# Altium PCB PCB.PcbDoc (part 1 of 2)
Units mm, origin at the board's own origin, x right, y up, seen from the top; angles counter-clockwise.
Board outline 80 x 80 mm, 4 copper layers (Top Layer, GND, PWR, Bottom Layer), stack 0.603 mm thick; 78 components, 41 nets, 213 pads, 529 vias.
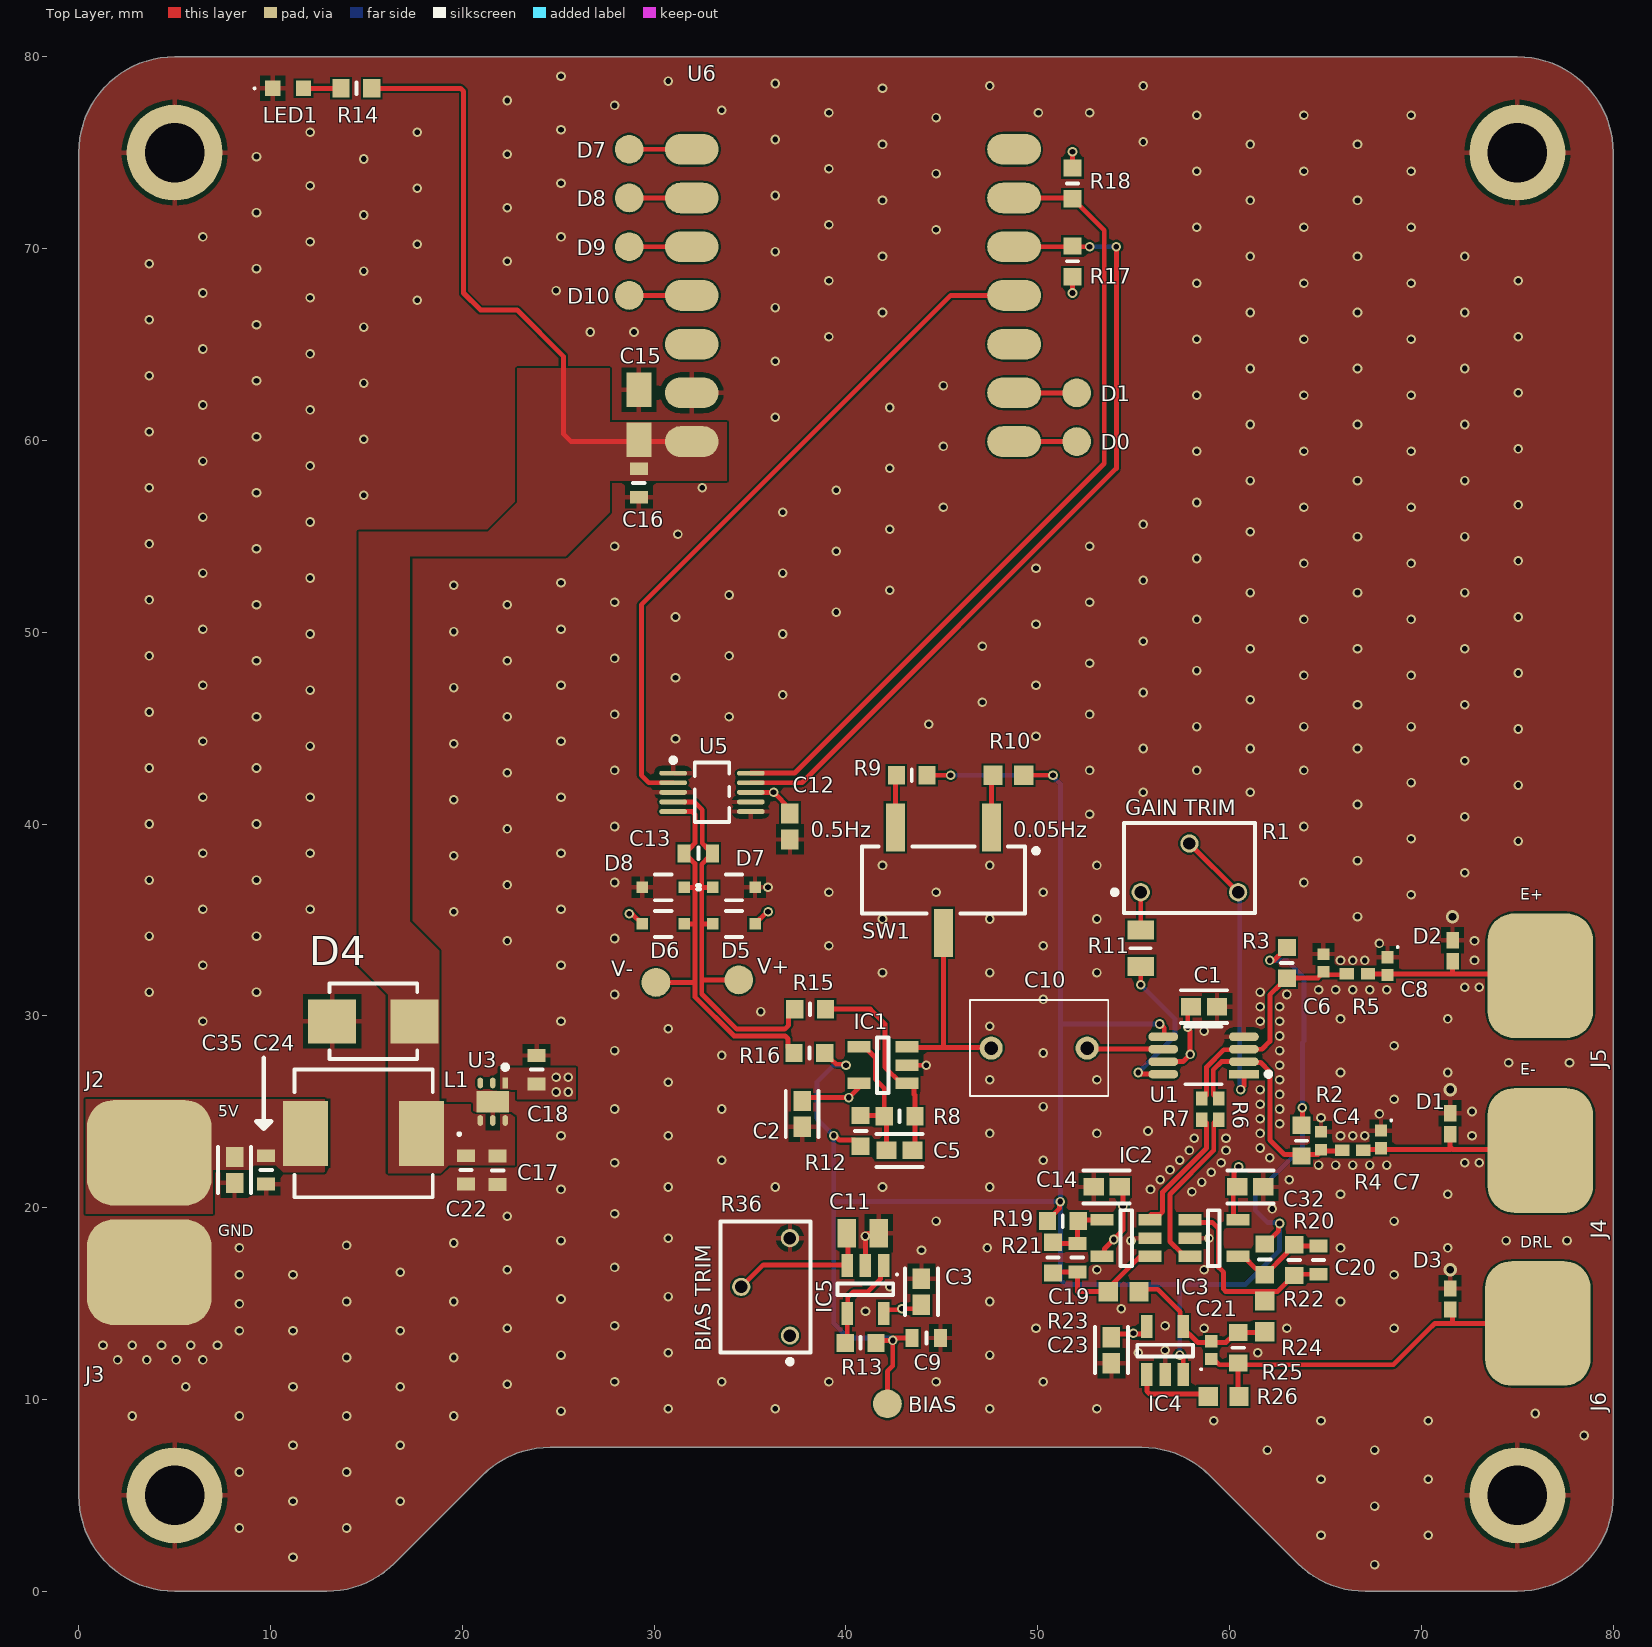
[diagram p0: Top Layer view]
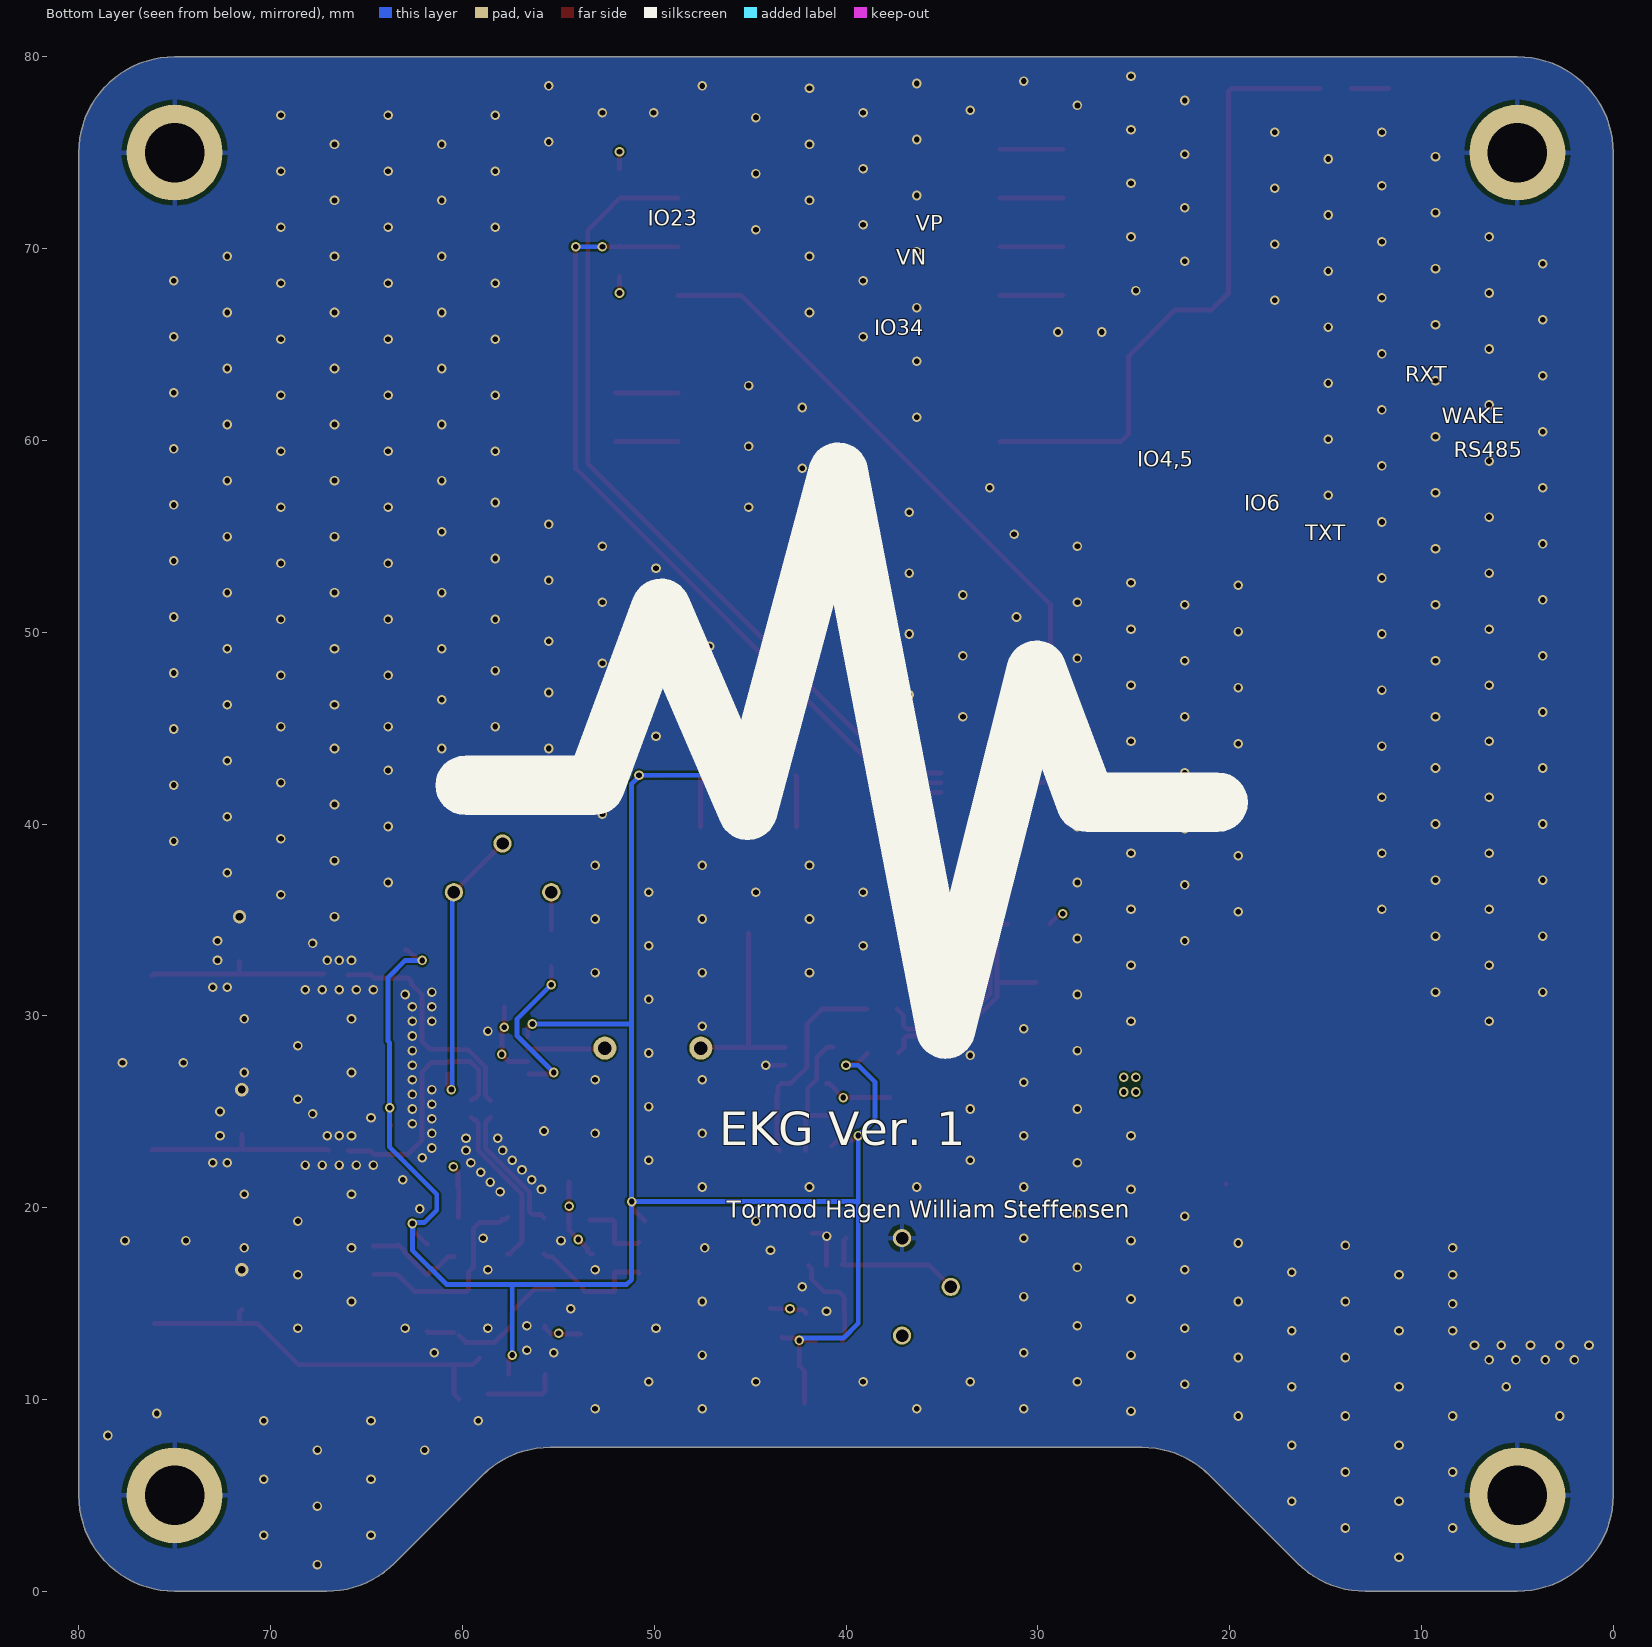
[diagram p1: Bottom Layer view, seen from below]
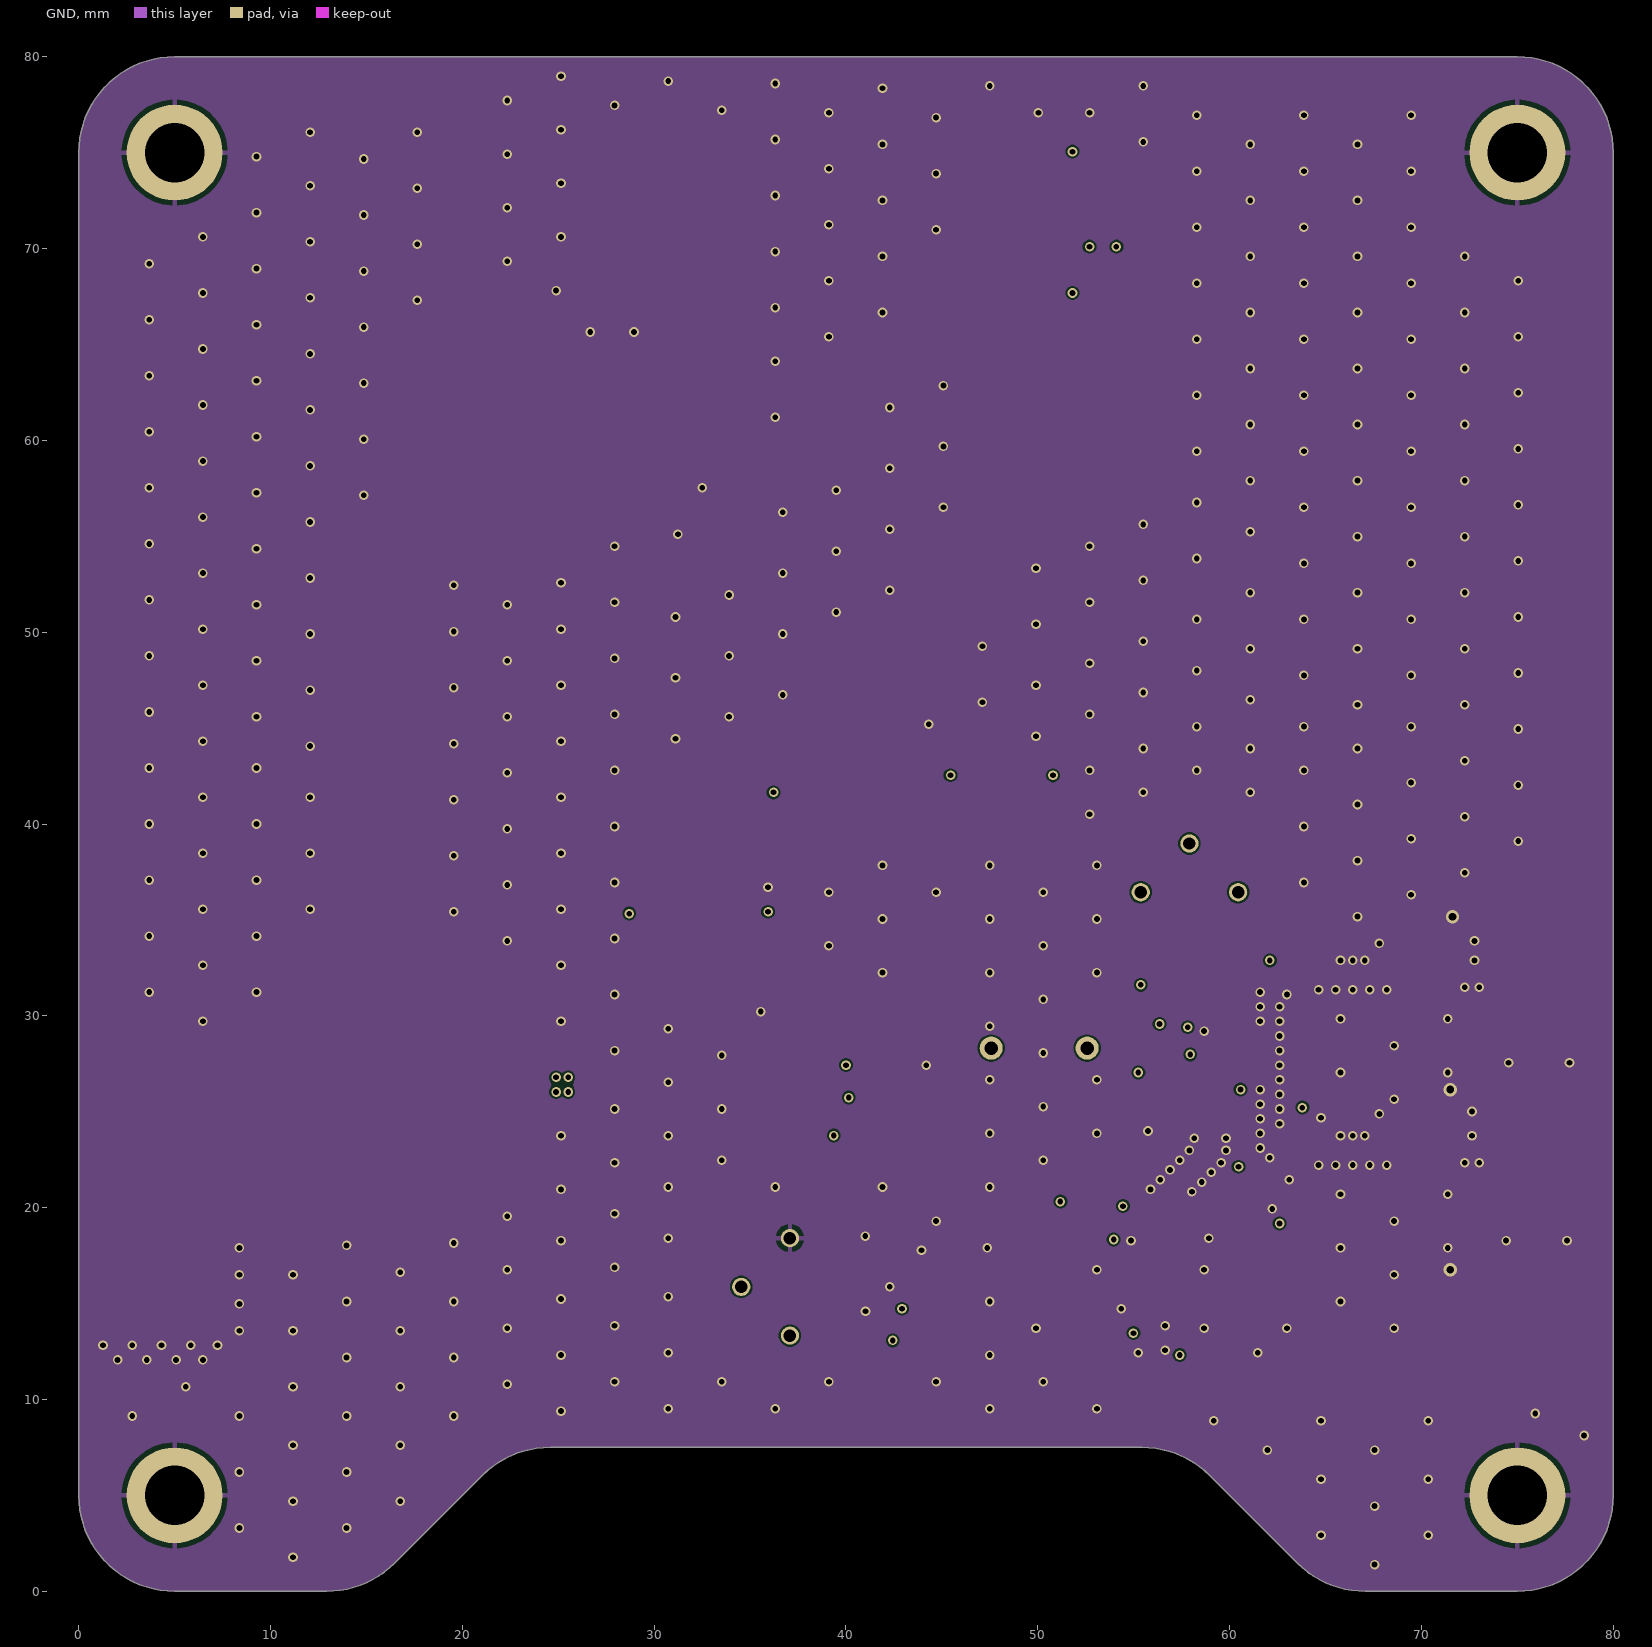
[diagram p2: GND]
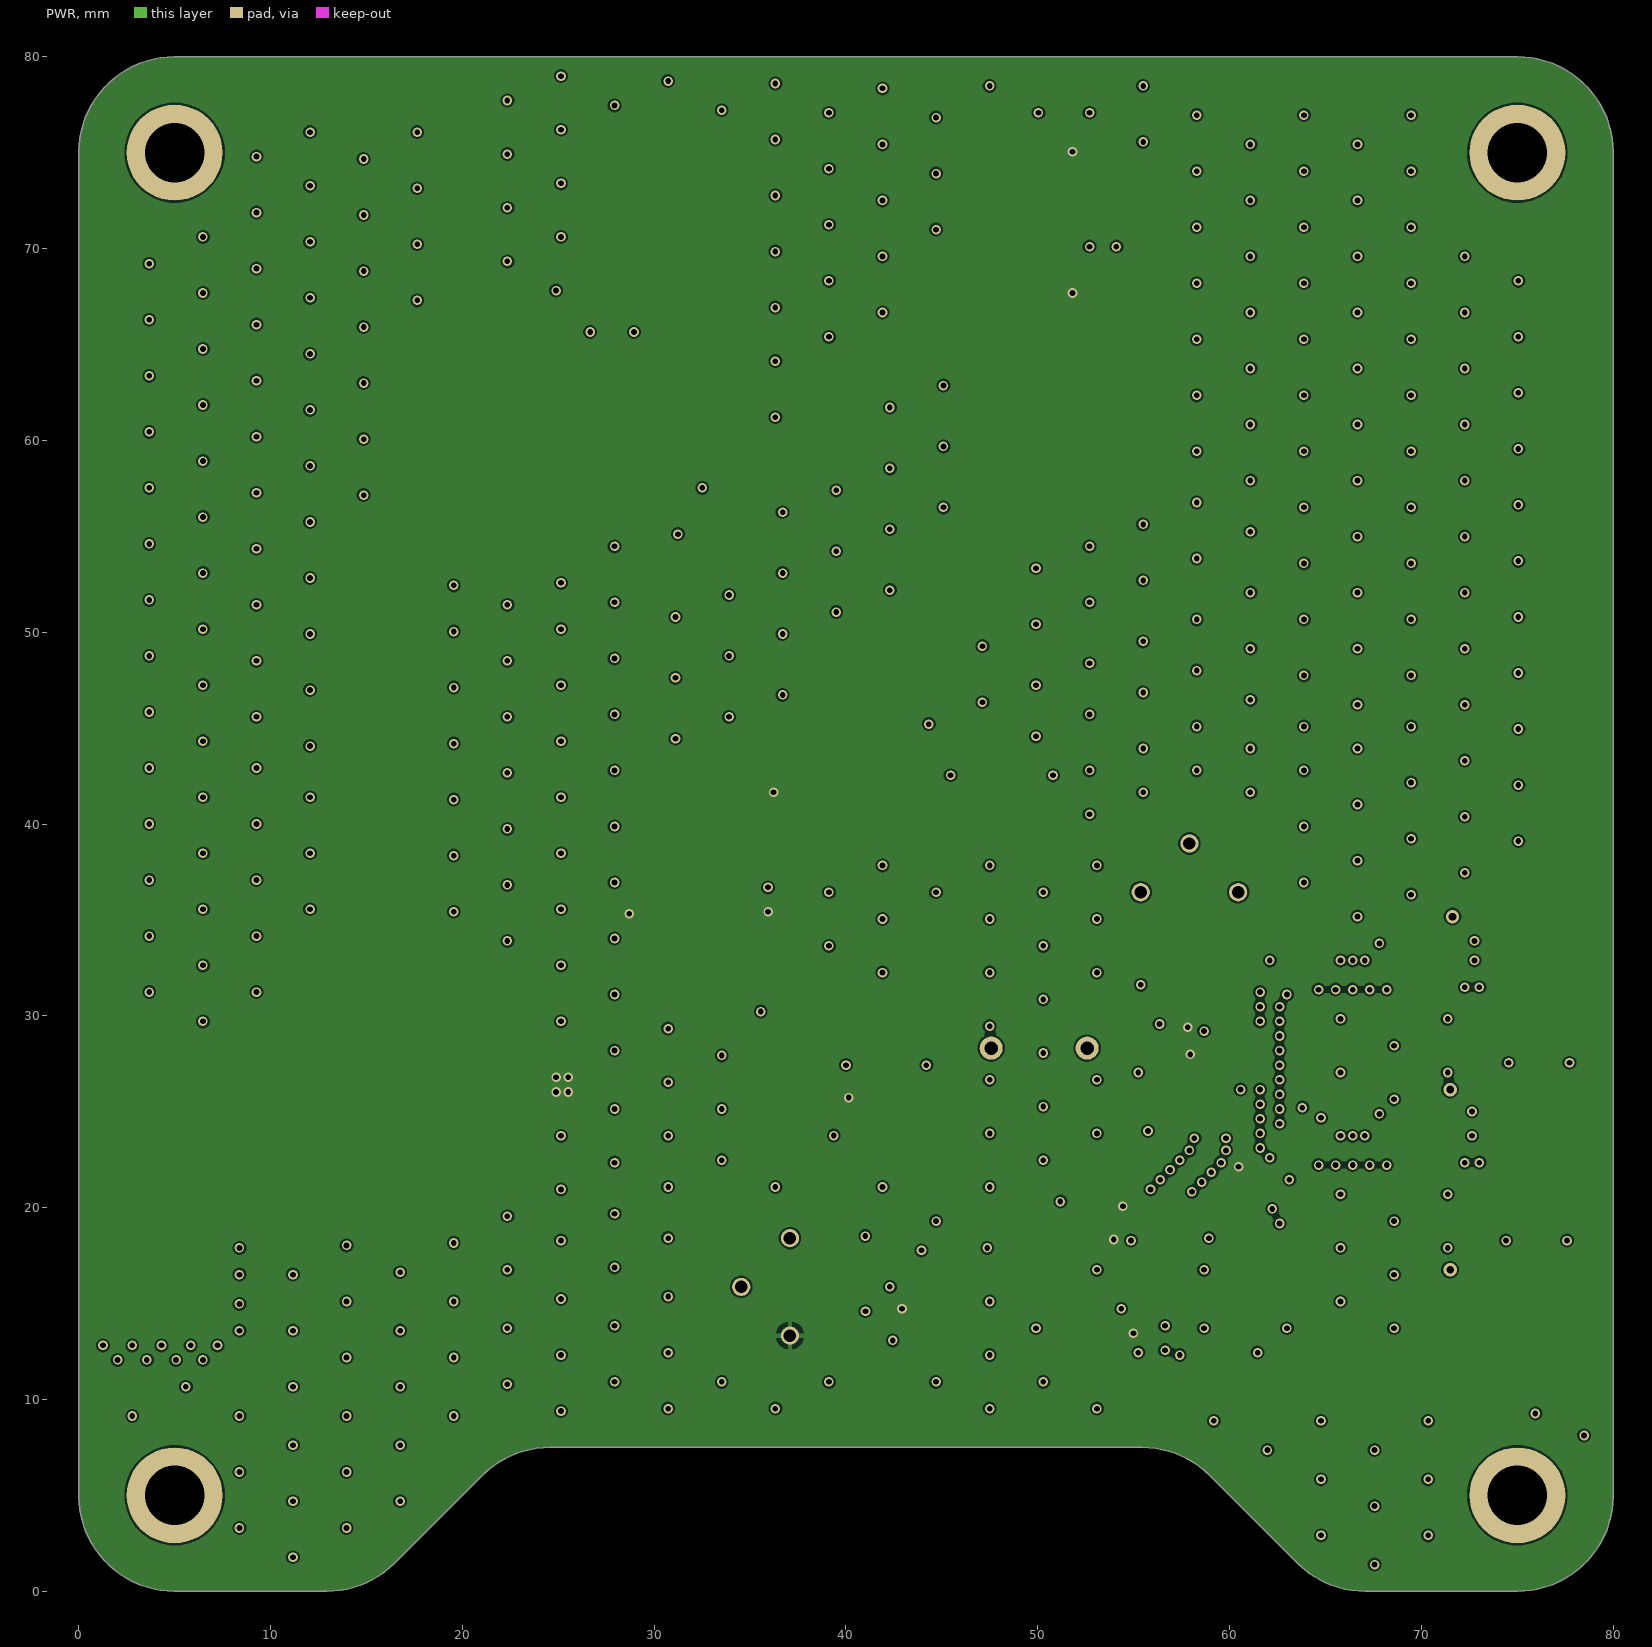
[diagram p3: PWR]
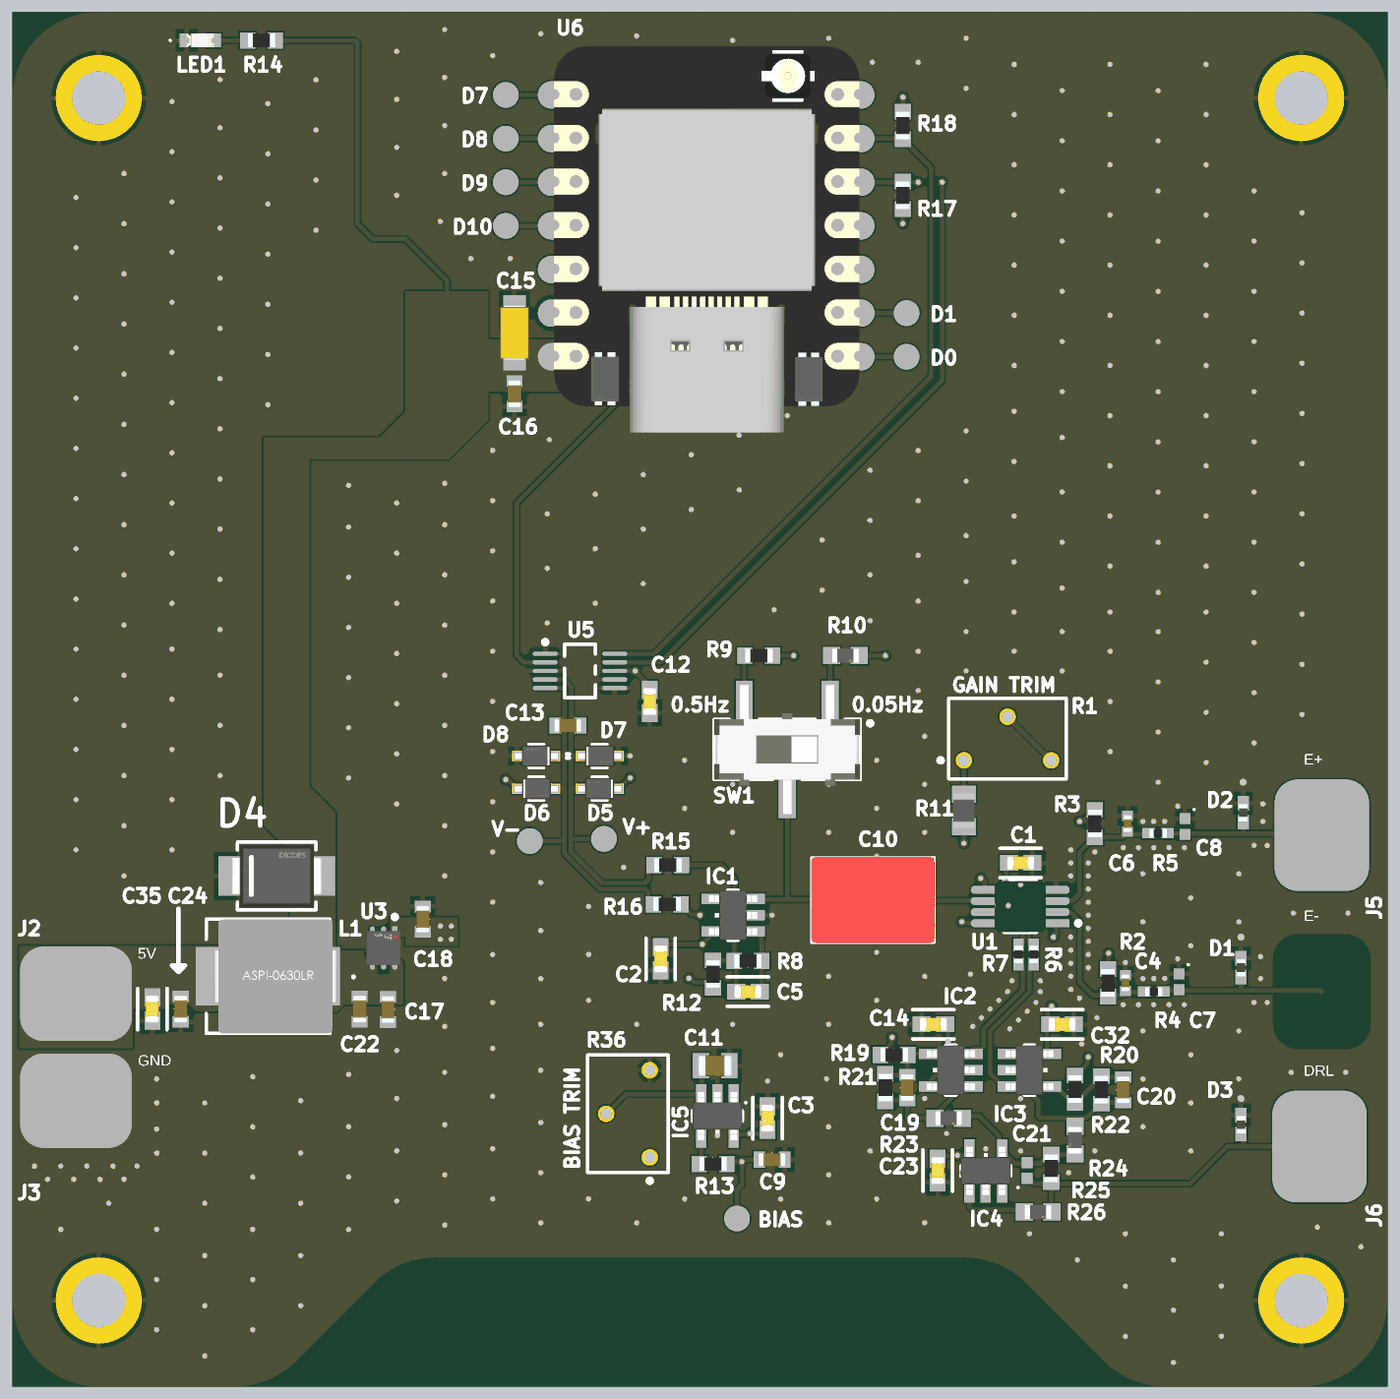
[diagram p4: 3D render of the assembled board from above, using the file's embedded part models]

## Layer stack, top to bottom
Top Solder: solder mask 0.0102, Solder Resist, Dk 3.5
Top Layer: signal copper 0.0356
Dielectric 2: prepreg 0.0711, PP-006, Dk 4.1
GND: signal copper 0.035
Dielectric 1: dielectric 0.32, FR-4, Dk 4.8
PWR: signal copper 0.035
Dielectric 3: prepreg 0.0711, PP-006, Dk 4.1
Bottom Layer: signal copper 0.0356
Bottom Solder: solder mask 0.0102, Solder Resist, Dk 3.5

## Board outline
5.006,0.006 cw(c5.006,5.006) 0.006,5.006 0.006,75.006 cw(c5.006,75.006) 5.006,80.006 75.006,80.006 cw(c75.006,75.006) 80.006,75.006 80.006,5.006 cw(c75.006,5.006) 75.006,0.006 67.077,0.006 cw(c67.077,5.006) 63.542,1.471 58.971,6.042 ccw(c55.435,2.506) 55.435,7.506 24.577,7.506 ccw(c24.577,2.506) 21.042,6.042 16.471,1.471 cw(c12.935,5.006) 12.935,0.006

## Design rules (kind name [scope] priority, off if disabled: settings)
AssemblyTestPointUsage [All] p1: isadvanced=TRUE
AssemblyTestpoint [All] p1: isadvanced=TRUE testpointundercomponent=TRUE minsize=1.016 maxsize=2.54 preferedsize=1.524 minholesize=0 maxholesize=1.016 preferedholesize=0.813 testpointgrid=0.025 usegrid=TRUE gridtolerance=0 allowsidetop=TRUE allowsidebottom=TRUE
Clearance Clearance_1 [All] p1: isadvanced=TRUE gap=0.1 ignorepadtopadclearanceinfootprint=FALSE
Clearance Clearance_1 [(ExistsOnLayer('GND') Or ExistsOnLayer('PWR')) vs (ExistsOnLayer('GND') Or ExistsOnLayer('PWR'))] p2: gap=0.254 ignorepadtopadclearanceinfootprint=FALSE sourcerule=42 cellrowname=All cellrowtype=0 cellcolname=All cellcoltype=0 innerlayers=TRUE
Clearance Clearance_2 [(ExistsOnLayer('Top Layer') Or ExistsOnLayer('Bottom Layer')) vs (ExistsOnLayer('Top Layer') Or ExistsOnLayer('Bottom Layer'))] p3: gap=0.254 ignorepadtopadclearanceinfootprint=FALSE sourcerule=42 cellrowname=All cellrowtype=0 cellcolname=All cellcoltype=0 outerlayers=TRUE
Clearance [All] p4: gap=0.254 ignorepadtopadclearanceinfootprint=FALSE ismatrix=TRUE
ComponentClearance [All] p1: isadvanced=TRUE gap=0.254 collisioncheckmode=3 verticalgap=0.254 showdistances=FALSE
FabricationTestPointUsage [All] p1: isadvanced=TRUE valid=0 allowmultiple=FALSE
FabricationTestpoint [All] p1: isadvanced=TRUE side=3 testpointundercomponent=TRUE minsize=1.016 maxsize=2.54 preferedsize=1.524 minholesize=0 maxholesize=1.016 preferedholesize=0.813 testpointgrid=0.025 allowsidetop=TRUE allowsidebottom=TRUE usegrid=TRUE gridtolerance=0
FanoutControl Fanout_BGA [IsBGA] p1: isadvanced=TRUE bgadir=Out bgaviamode=Centered fanoutstyle=Auto fanoutdirection=Alternating viagrid=0.025 // Fanout_BGA (Default Rule)
FanoutControl Fanout_LCC [IsLCC] p2: isadvanced=TRUE bgadir=Out bgaviamode=Centered fanoutstyle=Auto fanoutdirection=Alternating viagrid=0.025 // Fanout_LCC (Default Rule)
FanoutControl Fanout_SOIC [IsSOIC] p3: isadvanced=TRUE bgadir=Out bgaviamode=Centered fanoutstyle=Auto fanoutdirection=Alternating viagrid=0.025 // Fanout_SOIC (Default Rule)
FanoutControl Fanout_Small [(CompPinCount < 5)] p4: isadvanced=TRUE bgadir=Out bgaviamode=Centered fanoutstyle=Auto fanoutdirection=OutThenIn viagrid=0.025 // Fanout_Small (Default Rule)
FanoutControl Fanout_Default [All] p5: isadvanced=TRUE bgadir=Out bgaviamode=Centered fanoutstyle=Auto fanoutdirection=Alternating viagrid=0.025 // Fanout_Default (Default Rule)
Height [All] p1: isadvanced=TRUE minheight=0 maxheight=25.4 prefheight=12.7
HoleSize [All] p1: isadvanced=TRUE absolutevalues=TRUE maxlimit=4 minlimit=0.025 maxpercent=80.000 minpercent=20.000
HoleToHoleClearance [All] p1: isadvanced=TRUE gap=0.254 allowstackedmicrovias=TRUE
LayerPairs [All] p1: isadvanced=TRUE enforce=TRUE
MinimumSolderMaskSliver [All] p1: isadvanced=TRUE minsoldermaskwidth=0.1
NetAntennae [All] p1: isadvanced=TRUE netantennaetolerance=0
PasteMaskExpansion [All] p1: isadvanced=TRUE expansion=0
PlaneClearance [All] p1: isadvanced=TRUE clearance=0.508
PlaneConnect [All] p1: isadvanced=TRUE planeconnectstyle=Relief reliefexpansion=0.508 reliefentries=4 reliefconductorwidth=0.254 reliefairgap=0.254
PolygonConnect [All] p1: connectstyle=Relief reliefconductorwidth=0.254 reliefentries=4 polygonreliefangle="90 Angle" airgapwidth=0.254
RoutingCorners [All] p1: isadvanced=TRUE cornerstyle=45-Degree minsetback=2.54 maxsetback=2.54
RoutingPriority [All] p1: isadvanced=TRUE routingpriority=0
RoutingVias [All] p1: holewidth=0.711 width=1.27 viastyle="Through Hole" minholewidth=0.711 minwidth=1.27 maxholewidth=0.711 maxwidth=1.27
ShortCircuit [All] p1: isadvanced=TRUE allowed=FALSE
SilkToSilkClearance [All] p1: isadvanced=TRUE silktosilkclearance=0.1
SilkToSolderMaskClearance [IsPad] p1: isadvanced=TRUE minsilkscreentomaskgap=0.2 clearancetoexposedcopper=TRUE
SolderMaskExpansion SolderMaskExpansion_vias [IsVia] p1: isadvanced=TRUE expansion=0 istentingtop=TRUE useseparateexpansions=TRUE expansionbottom=0 istentingbottom=TRUE
SolderMaskExpansion [All] p2: isadvanced=TRUE expansion=0 istentingtop=FALSE
SupplyNets "Schematic Supply Nets_5" [InNet('1.5V')] p1: isadvanced=TRUE voltage=0.000
SupplyNets "Schematic Supply Nets_4" [InNet('GND')] p2: isadvanced=TRUE voltage=0.000
SupplyNets "Schematic Supply Nets_2" [InNet('+5')] p3: isadvanced=TRUE voltage=0.000
SupplyNets "Schematic Supply Nets_1" [InNet('3.3V')] p4: isadvanced=TRUE voltage=0.000
UnRoutedNet [All] p1: isadvanced=TRUE
UnpouredPolygon [All] p1: isadvanced=TRUE
Width [All] p1: maxlimit=0.254 minlimit=0.254 preferedwidth=0.254
4 further rules are at their usual default settings.

## Classes and differential pairs
component class "Right leg drive": C14 C19 C20 C21 C23 C32 D3 IC2 IC3 IC4 R19 R20 R21 R22 R23 R24 R25 R26
component class "Power supply": C17 C18 U3
component class "Digital circuit": C12 C13 C15 C16 D5 D6 D7 D8 LED1 R14 R15 R16 R17 R18 U5 U6
component class Connectors: C22 C24 C35 D4 J2 J3 J4 J5 J6 L1
component class "Analog frontend": C1 C2 C3 C4 C5 C6 C7 C8 C9 C10 C11 D1 D2 IC1 IC5 R1 R2 R3 R4 R5 R6 R7 R8 R9 R10 R11 R12 R13 R36 SW1 U1

## Components (designator, comment, footprint, x,y, rotation, side; value= is the part's Value field where it differs from the comment)
C1 "CC0603KRX7R9BB104" FP-CC0603-DA-IPC_B 58.674,30.48 r180 top value=100nF
C2 "CC0603KRX7R9BB104" FP-CC0603-DA-IPC_B 37.719,24.892 r90 top value=100nF
C3 "CC0603KRX7R9BB104" FP-CC0603-DA-IPC_B 43.942,15.621 r270 top value=100nF
C4 "0402CG470J500NT" CAPC1005X55N 64.77,23.495 r270 top
C5 "CC0603KRX7R9BB104" FP-CC0603-DA-IPC_B 42.799,22.987 r180 top value=100nF
C6 "0402CG470J500NT" CAPC1005X55N 64.897,32.766 r270 top
C7 "TCC0402COG220J500AT" TCC0402COG220J500AT 67.898,23.562 r270 top
C8 "TCC0402COG220J500AT" TCC0402COG220J500AT 68.238,32.599 r270 top
C9 "CL10A105KB8NNNC" CAPC1608X90N 44.196,13.208 r180 top
C10 "MKS2C041001F00JSSD" MKS2C041001F00JSSD 52.578,28.321 r180 top
C11 "CL21A106KAYNNNE" CAPC2012X145N 40.883,18.669 r180 top
C12 "CC0603KRX7R9BB104" FP-CC0603-DA-IPC_B 37.084,39.878 r90 top value=100nF
C13 "0603B103K500NT" CAPC1608X90N 32.308,38.474 r0 top
C14 "CC0603KRX7R9BB104" FP-CC0603-DA-IPC_B 53.594,21.082 r0 top value=100nF
C15 "TAJA106K016RNJV" CAPPM3216X180N 29.21,61.341 r90 top
C16 "CL10A105KB8NNNC" CAPC1608X90N 29.21,57.785 r90 top
C17 "CL10A106KP8NNNC" CAPC1608X90N 21.844,21.949 r90 top
C18 "CL10A106KP8NNNC" CAPC1608X90N 23.876,27.2 r270 top
C19 "GRM1885C1H471JA01D" CAPC1608X90N 52.07,17.399 r90 top
C20 "GRM1885C1H471JA01D" CAPC1608X90N 64.643,17.272 r90 top
C21 "0402B471K500NT" "Copy of KGM05DR50J226MH" 59.055,12.573 r90 top value=470pF
C22 "CL10A475KO8NNNC" CAPC1608X90N 20.193,21.971 r90 top
C23 "CC0603KRX7R9BB104" FP-CC0603-DA-IPC_B 53.848,12.573 r90 top value=100nF
C24 "CL10A475KO8NNNC" CAPC1608X90N 9.779,21.971 r90 top
C32 "CC0603KRX7R9BB104" FP-CC0603-DA-IPC_B 61.087,21.082 r180 top value=100nF
C35 "CC0603KRX7R9BB104" FP-CC0603-DA-IPC_B 8.128,21.971 r270 top value=100nF
D1 "0402ESDA-05N" DIONC1005X60N 71.501,24.384 r270 top
D2 "0402ESDA-05N" DIONC1005X60N 71.628,33.401 r270 top
D3 "0402ESDA-05N" DIONC1005X60N 71.501,15.24 r270 top
D4 "SMBJ5.0CA-13-F" FP-SMB-CA-MFG 15.367,29.718 r0 top value=1nF
D5 "BAT54J,115" FP-SOD323F-MFG 34.163,34.798 r180 top value=10pF
D6 "BAT54J,115" FP-SOD323F-MFG 30.48,34.798 r0 top value=10pF
D7 "BAT54J,115" FP-SOD323F-MFG 34.163,36.703 r0 top value=10pF
D8 "BAT54J,115" FP-SOD323F-MFG 30.48,36.703 r180 top value=10pF
IC1 "OPA376AIDBVR" SOT95P280X145-5N 41.93,27.432 r180 top
IC2 "TLV9061IDBVR" SOT95P280X145-5N 54.61,18.415 r180 top
IC3 "TLV9061IDBVR" SOT95P280X145-5N 59.182,18.415 r0 top
IC4 "TLV9061IDBVR" SOT95P280X145-5N 56.642,12.553 r90 top
IC5 "OPA376AIDBVR" SOT95P280X145-5N 41.021,15.748 r270 top
J2 "PCB_PAD_LARGE_5.5mm" PCB_MOTOR_PAD-Footprint-1#1 3.683,22.86 r180 top
J3 "PCB_PAD_LARGE_5.5mm" PCB_MOTOR_PAD-Footprint-1#1 3.683,16.637 r180 top
J4 "PCB_PAD_LARGE_5.5mm" PCB_MOTOR_PAD-Footprint-1#2 76.378,-24.835 r90 top
J5 "PCB_PAD_LARGE_5.5mm" PCB_MOTOR_PAD-Footprint-1#3 76.521,34.29 r90 top
J6 "PCB_PAD_LARGE_5.5mm" PCB_MOTOR_PAD-Footprint-1#4 76.136,11.882 r90 top
L1 "ASPI-0630LR-4R7M-T15" ASPI-0630LR 14.859,23.876 r180 top
LED1 "598-8070-107F" 5988070107F 10.922,78.359 r0 top
R1 "3266W-1-104LF" BOUR-3266W-3_V 57.912,37.719 r0 top value=100k
R2 "0603WAF1005T5E" RESC1608X55N 63.754,23.495 r90 top
R3 "0603WAF1005T5E" RESC1608X55N 62.992,32.766 r90 top
R4 "0402WGF4702TCE" RESC1005X40N 66.421,22.987 r180 top
R5 "0402WGF4702TCE" RESC1005X40N 66.672,32.204 r180 top
R6 "0402WGF1004TCE" RESC1005X40N 59.436,25.146 r90 top
R7 "0402WGF1004TCE" RESC1005X40N 58.547,25.146 r90 top
R8 "0603WAF1003T5E" RESC1608X55N 42.799,24.765 r0 top
R9 "0603WAF3303T5E" RESC1608X55N 43.434,42.545 r180 top
R10 "0603WAF3304T5E" 0603WAF3304T5E 48.476,42.545 r180 top value=3.3M
R11 "RMCF0805JT22K0" RESC2012X65N 55.372,33.528 r90 top
R12 "0603WAF1001T5E" RESC1608X55N 40.767,24.003 r90 top
R13 "0603WAF220JT5E" RESC1608X55N 40.767,12.954 r0 top
R14 "0603WAF1001T5E" RESC1608X55N 14.478,78.359 r180 top
R15 "0603WAF2702T5E" RESC1608X55N 38.138,30.353 r180 top
R16 "0603WAF2702T5E" RESC1608X55N 38.1,28.067 r180 top
R17 "0603WAF4701T5E" RESC1608X55N 51.816,69.342 r270 top
R18 "0603WAF4701T5E" RESC1608X55N 51.816,73.406 r90 top
R19 "0603WAF3003T5E" RESC1608X55N 51.308,19.304 r180 top
R20 "0603WAF3003T5E" RESC1608X55N 61.834,17.306 r90 top
R21 "0603WAF3003T5E" RESC1608X55N 50.8,17.399 r90 top
R22 "0603WAF3003T5E" RESC1608X55N 63.373,17.272 r90 top
R23 "0603WAF1003T5E" 0603WAF3304T5E 54.483,15.621 r180 top value=100k
R24 "0603WAF1003T5E" 0603WAF3304T5E 61.834,14.339 r90 top value=100k
R25 "0603WAF1004T5E" RESC1608X55N 60.452,12.7 r90 top
R26 "0603WAF1003T5E" 0603WAF3304T5E 59.69,10.16 r180 top value=100k
R36 "3266W-1-104LF" BOUR-3266W-3_V 35.814,15.875 r90 top value=100k
SW1 "JS102011SCQN" FP-JS102011SCQN-MFG 45.085,37.084 r180 top
U1 "INA333AIDGKT" FP-DGK0008A-IPC_B 58.648,27.94 r180 top value=100GΩ
U3 "LP5912-3.3DRVT" FP-DRV0006A-IPC_C 21.59,25.527 r270 top
U5 "ADS1115IDGST" TI-DGS10_L 33.02,41.656 r0 top
U6 "XIAO ESP32S3" "XIAO ESP32S3-Footprint-1" 31.968,75.184 r0 top

## Footprints (in the part's own frame and the unit in brackets; to place one, negate y for a bottom-side part, rotate by r counter-clockwise, add the part's x,y. Pads: shape width x height; smd on the part's side, far side on the other; paste and mask are expansions set on the pad)
0603WAF3304T5E [mm]
  rect 1x1 smd paste+0 mask+0: 1(-0.8,0) 2(0.8,0)
  body extent -1.4,-0.6 1.4,0.6, height 0.25
5988070107F [mm]
  rect 0.8x0.8 smd: 1(-0.8,0) 2(0.8,0)
  silkscreen extent -1.8,-0.05 -1.7,0.05, body extent -0.8,-0.4 0.8,0.4, height 0.7
ASPI-0630LR [mm]
  rect 2.35x3.4 smd: 1(-3.025,0) 2(3.025,0)
  silkscreen extent -5.02,-3.32 3.6,3.32, body extent -4.04,-3.32 3.16,3.32, height 3
BOUR-3266W-3_V [mm] "THD, 3-Leads, Body 6.6x4.69mm, Pitch 2.54mm"
  round 0.95 hole 0.65: 1(-2.54,-1.27) 2(0,1.27) 3(2.54,-1.27)
  silkscreen extent -4.02,-2.34 3.42,2.34, body extent -3.3,-2.35 3.3,2.35, height 8.51
CAPC1005X55N [mm]
  rect 0.6x0.62 smd: 1(-0.46,0) 2(0.46,0)
  body extent -0.5,-0.25 0.5,0.25, height 0.55
CAPC1608X90N [mm]
  rect 0.67x0.94 smd: 1(-0.74,0) 2(0.74,0)
  silkscreen extent 0,-0.3 0,0.3, body extent -0.8,-0.4 0.8,0.4, height 0.9
CAPC2012X145N [mm]
  rect 0.97x1.47 smd: 1(-0.83,0) 2(0.83,0)
  body extent -1,-0.63 1,0.63, height 1.45
CAPPM3216X180N [mm]
  rect 1.8x1.3 smd: 1(-1.3,0) 2(1.3,0)
  body extent -1.6,-0.82 1.6,0.82, height 1.8
"Copy of KGM05DR50J226MH" [mm] "Multilayer Ceramic Capacitors MLCC - SMD/SMT 6.3V 22uF X5R 0402 2 0%"
  rect 0.64x0.64 smd: 1(-0.46,0) 2(0.46,0)
  silkscreen extent -1.04,0.48 -0.94,0.58, body extent -0.55,-0.3 0.55,0.3, height 0.6
DIONC1005X60N [mm]
  rect 0.85x0.65 smd: 1(-0.55,0) 2(0.55,0)
  body extent -0.5,-0.25 0.5,0.25, height 0.6
FP-CC0603-DA-IPC_B [mm]
  rect 1.058x0.912 smd paste+0 mask+0: 1(-0.677,0) 2(0.677,0)
  silkscreen extent -1.21,-0.86 1.21,0.86, body extent -1.46,-0.71 1.46,0.71, height 0.25
FP-DGK0008A-IPC_B [mm]
  rect 1.557x0.458 smd paste+0 mask+0: 1(-2.101,0.975)
  rrect100% 1.557x0.458 smd paste+0 mask+0: 2(-2.101,0.325) 3(-2.101,-0.325) 4(-2.101,-0.975) 5(2.101,-0.975) 6(2.101,-0.325) 7(2.101,0.325) 8(2.101,0.975)
  silkscreen extent -3.5,-1.5 0.95,1.5, body extent -3.13,-1.75 3.13,1.75, height 0.25
FP-DRV0006A-IPC_C [mm]
  rect 0.556x0.292 smd paste+0 mask+0: 1(-0.978,0.65)
  rrect100% 0.556x0.292 smd paste+0 mask+0: 2(-0.978,0) 3(-0.978,-0.65) 4(0.978,-0.65) 5(0.978,0) 6(0.978,0.65)
  rect 1.1x1.7 smd paste-1000 mask+0: 7(0,0)
  silkscreen extent -1.93,0.53 -1.68,0.78, body extent -1.36,-1.1 1.36,1.1, height 0.25
FP-JS102011SCQN-MFG [mm]
  rect 1x2.5 smd paste+0 mask+0: 1(-2.5,-2.75) 2(0,2.75) 3(2.5,-2.75)
  silkscreen extent -4.95,-1.75 4.25,1.75, body extent -4.35,-4.1 4.35,4.1, height 0.25
FP-SMB-CA-MFG [mm]
  rect 2.5x2.3 smd paste+0 mask+0: 1(-2.15,0) 2(2.15,0)
  silkscreen extent -2.28,-1.97 2.28,1.97, body extent -3.5,-2.07 3.5,2.07, height 0.25
FP-SOD323F-MFG [mm]
  rect 0.6x0.6 smd paste-1000 mask+0: 1(-1.1,0) 2(1.1,0)
  silkscreen extent -0.43,-0.67 0.43,0.67, body extent -1.53,-0.82 1.53,0.82, height 0.25
MKS2C041001F00JSSD [mm]
  round 1.2 hole 0.7: 1(0,0) 2(5,0)
  silkscreen extent -1.1,-2.5 6.1,2.5, body extent -1.1,-2.5 6.1,2.5, height 10.01
PCB_MOTOR_PAD-Footprint-1#1 [mm]
  rrect50% 6.5x5.5 smd: 1(0,0)
PCB_MOTOR_PAD-Footprint-1#2 [mm]
  rrect50% 6.5x5.5 smd: 1(47.822,0.174)
PCB_MOTOR_PAD-Footprint-1#3 [mm]
  rrect50% 6.5x5.5 smd: 1(-2.197,0.317)
PCB_MOTOR_PAD-Footprint-1#4 [mm]
  rrect50% 6.5x5.5 smd: 1(2.088,0.063)
RESC1005X40N [mm]
  rect 0.75x0.6 smd: 1(-0.55,0) 2(0.55,0)
  body extent -0.5,-0.25 0.5,0.25, height 0.4
RESC1608X55N [mm]
  rect 0.9x0.95 smd: 1(-0.8,0) 2(0.8,0)
  silkscreen extent 0,-0.3 0,0.3, body extent -0.8,-0.4 0.8,0.4, height 0.55
RESC2012X65N [mm]
  rect 1x1.4 smd: 1(-0.95,0) 2(0.95,0)
  silkscreen extent 0,-0.53 0,0.53, body extent -1,-0.63 1,0.62, height 0.5
SOT95P280X145-5N [mm]
  rect 1.2x0.6 smd: 1(-1.25,0.95) 2(-1.25,0) 3(-1.25,-0.95) 4(1.25,-0.95) 5(1.25,0.95)
  silkscreen extent -0.3,-1.45 0.3,1.45, body extent -1.4,-1.45 1.4,1.45, height 1.2
TCC0402COG220J500AT [mm] "Multilayer Ceramic Capacitors MLCC - SMD/SMT 6.3V 22uF X5R 0402 2 0%"
  rect 0.64x0.64 smd: 1(-0.46,0) 2(0.46,0)
  silkscreen extent -1.04,0.48 -0.94,0.58, body extent -0.55,-0.3 0.55,0.3, height 0.6
TI-DGS10_L [mm] "SOP, 10-Leads, Body 3x3mm, Pitch 0.5mm, IPC High Density"
  oval 1.45x0.25 smd: 1(-2.025,1) 2(-2.025,0.5) 3(-2.025,0) 4(-2.025,-0.5) 5(-2.025,-1) 6(2.025,-1) 7(2.025,-0.5) 8(2.025,0) 9(2.025,0.5) 10(2.025,1)
  silkscreen extent -2.15,-1.55 0.9,1.8, body extent -1.55,-1.55 1.55,1.55, height 1.1
"XIAO ESP32S3-Footprint-1" [mm]
  oval 2.8x1.6 smd: 1(0,0) 2(0,-2.54) 3(0,-5.08) 4(0,-7.62) 5(0,-10.16) 6(0,-12.7) 7(0,-15.24) 8(16.8,-15.24) 9(16.8,-12.7) 10(16.8,-10.16) 11(16.8,-7.62) 12(16.8,-5.08) 13(16.8,-2.54) 14(16.8,0)
  body extent -0.46,-19.65 17.32,2.83, height 4.21

## Part data
C1 C2 C3 C5 C12 C14 C23 C32 C35: library part CMP-001-00148-1, "Multilayer Ceramic Capacitor, CC Series, 0.1 - F, - 10%, X7R, 50 V, 0603 [1608 Metric]", Case Code (Imperial)=0603, Case Code (Metric)=1608, Dielectric=X7R, Dielectric Material=Ceramic, Max Operating Temperature=125°C, Min Operating Temperature=-55°C, Tolerance=10%, Voltage=50V, Case/Package=0603, China RoHS=Compliant, Country of Origin="Mainland China, Taiwan", Depth=800µm, Export Control Classification Number (ECCN) Code=EAR99, Halogen Free="Halogen Free", Harmonized Tariff Schedule (HTS) Code=8532.24.00.20, Height=800µm, Introduction Date=2005-08-18, Lead Free="Lead Free", Length=1.6mm, Lifecycle Status=Production, Material=Ceramic, Mounting Technology="Surface Mount", Number of Terminals=2, Pins=2, Radiation Hardening=No, REACH SVHC=Unaffected, RoHS=Compliant, Schedule B="8532240020, 8532240020", Termination=SMD/SMT, Thickness=889µm, Voltage Rating=50V, Voltage Rating (DC)=50V, Width=800µm
C4 C6: "Capacitor", Manufacturer_Name="Guangdong Fenghua Advanced Tech", Datasheet Link=https://datasheet.lcsc.com/szlcsc/Guangdong-Fenghua-Advanced-Tech-0402CG470J500NT_C1567.pdf, Height=0.55mm, Manufacturer_Part_Number=0402CG470J500NT
C7 C8: library part CMP-001-00152-1, "50V 22pF C0G ±5% 0402 Multilayer Ceramic Capacitors MLCC - SMD/SMT ROHS"
C9 C16: "Capacitor", Manufacturer_Name=SAMSUNG, Mouser Part Number=187-CL10A105KB8NNNC, Arrow Part Number=CL10A105KB8NNNC, Arrow Price/Stock=https://www.arrow.com/en/products/cl10a105kb8nnnc/samsung-electro-mechanics.html?utm_currency=USD&region=nac, Datasheet Link=https://datasheet.datasheetarchive.com/originals/distributors/Datasheets-DGA10/2411562.pdf, Height=0.9mm, Manufacturer_Part_Number=CL10A105KB8NNNC, Mouser Price/Stock=https://www.mouser.co.uk/ProductDetail/Samsung-Electro-Mechanics/CL10A105KB8NNNC?qs=ktYoCbbtCSJz4pFCLWXd5g%3D%3D
C10: "Capacitor", Manufacturer_Name=WIMA, Mouser Part Number=505-MKS21.0/63/5, Arrow Part Number=MKS2C041001F00JSSD, Arrow Price/Stock=https://www.arrow.com/en/products/mks2c041001f00jssd/wima?region=europe, Datasheet Link=https://www.digikey.com/en/products/detail/wima/MKS2C041001F00JSSD/19251598, Height=10mm, Manufacturer_Part_Number=MKS2C041001F00JSSD, Mouser Price/Stock=https://www.mouser.co.uk/ProductDetail/WIMA/MKS2C041001F00JSSD?qs=ISKKXg98%252B1lQgUuGZjf9mQ%3D%3D
C11: "Capacitor", Manufacturer_Name=SAMSUNG, Mouser Part Number=187-CL21A106KAYNNNE, Arrow Part Number=CL21A106KAYNNNE, Arrow Price/Stock=https://www.arrow.com/en/products/cl21a106kaynnne/samsung-electro-mechanics.html?utm_currency=USD&region=nac, Datasheet Link=https://datasheet.datasheetarchive.com/originals/distributors/Datasheets_SAMA/6a45835c9b7400e9b49c55c38a8ff4a2.pdf, Height=1.45mm, Manufacturer_Part_Number=CL21A106KAYNNNE, Mouser Price/Stock=https://www.mouser.co.uk/ProductDetail/Samsung-Electro-Mechanics/CL21A106KAYNNNE?qs=yOVawPpwOwmTXAd4dJtNjA%3D%3D
C13: "Capacitor", Manufacturer_Name="Fenghua Advanced Technology (Holding) CO.", Datasheet Link=https://www.datasheets360.com/pdf/5043620394403009653, Height=0.9mm, Manufacturer_Part_Number=0603B103K500NT
C15: "Capacitor Polarised", Manufacturer_Name="Kyocera AVX", Mouser Part Number=581-TAJA106K016RNJV, Arrow Part Number=TAJA106K016RNJV, Arrow Price/Stock=https://www.arrow.com/en/products/taja106k016rnjv/avx?utm_currency=USD&region=nac, Datasheet Link=http://www.farnell.com/datasheets/1680476.pdf, Height=1.8mm, Manufacturer_Part_Number=TAJA106K016RNJV, Mouser Price/Stock=https://www.mouser.co.uk/ProductDetail/KYOCERA-AVX/TAJA106K016RNJV?qs=X421pCAdHWe2u1fVMeO6XQ%3D%3D
C17 C18: "Capacitor", Manufacturer_Name=SAMSUNG, Mouser Part Number=187-CL10A106KP8NNNC, Arrow Part Number=CL10A106KP8NNNC, Arrow Price/Stock=https://www.arrow.com/en/products/cl10a106kp8nnnc/samsung-electro-mechanics.html?utm_currency=USD&region=europe, Datasheet Link=https://datasheet.datasheetarchive.com/originals/distributors/Datasheets-DGA10/2415998.pdf, Height=0.9mm, Manufacturer_Part_Number=CL10A106KP8NNNC, Mouser Price/Stock=https://www.mouser.co.uk/ProductDetail/Samsung-Electro-Mechanics/CL10A106KP8NNNC?qs=X6jEic%2FHinAlyfRHj7fKwg%3D%3D
C19 C20: "Capacitor", Manufacturer_Name="Murata Electronics", Mouser Part Number=81-GRM39C471J50, Arrow Part Number=GRM1885C1H471JA01D, Arrow Price/Stock=https://www.arrow.com/en/products/grm1885c1h471ja01d/murata-manufacturing.html?utm_currency=USD&region=europe, Datasheet Link=https://search.murata.co.jp/Ceramy/image/img/A01X/G101/ENG/GRM1885C1H471JA01-01A.pdf, Height=0.9mm, Manufacturer_Part_Number=GRM1885C1H471JA01D, Mouser Price/Stock=https://www.mouser.co.uk/ProductDetail/Murata-Electronics/GRM1885C1H471JA01D?qs=dDtGB%252BtNe6pvV5u0%2FOvNVA%3D%3D
C21: library part CMP-001-00150-3, "50V 470pF X7R ±10% 0402 Multilayer Ceramic Capacitors MLCC - SMD/SMT ROHS", Case/Package=0402, Dielectric Material=Ceramic, Max Operating Temperature=125°C, Min Operating Temperature=-55°C, Voltage Rating (DC)=50V, Height=500µm, Length=1mm, Lifecycle Status=Production, Mounting Technology="Surface Mount", Number of Terminals=2, REACH SVHC=Unaffected, RoHS=Compliant, Width=500µm
C22 C24: "Capacitor", Manufacturer_Name=SAMSUNG, Mouser Part Number=187-CL10A475KO8NNNC, Arrow Part Number=CL10A475KO8NNNC, Arrow Price/Stock=https://www.arrow.com/en/products/cl10a475ko8nnnc/samsung-electro-mechanics.html?utm_currency=USD&region=nac, Datasheet Link=https://rs.componentsearchengine.com/Datasheets/2/CL10A475KO8NNNC.pdf, Height=0.9mm, Manufacturer_Part_Number=CL10A475KO8NNNC, Mouser Price/Stock=https://www.mouser.co.uk/ProductDetail/Samsung-Electro-Mechanics/CL10A475KO8NNNC?qs=X6jEic%2FHinAbIjmLnFfqqQ%3D%3D
D1 D2 D3: "TVS Diode (Bi-directional)", Manufacturer_Name="Bourne Semicon", Datasheet Link=https://datasheet.lcsc.com/szlcsc/1811061308_Bourne-Semicon-Shenzhen-0402ESDA-05N_C316049.pdf, Height=0.6mm, Manufacturer_Part_Number=0402ESDA-05N
D4: library part CMP-004-00056-1, "SMBJ5.0CA Series 600 W 5.0 V Surface Mount Bi-Directional TVS Diode - DO-214AA", Breakdown Voltage=6.8V, Case/Package=SMB, Clamping Voltage=9.2V, Leakage Current=1.6mA, Max Breakdown Voltage=7.23V, Max Junction Temperature (Tj)=150°C, Max Output current=65.2A, Max Power Dissipation=5W, Min Breakdown Voltage=6.4V, Min Operating Temperature=-55°C, Peak Pulse Power=600W, Reverse Standoff Voltage=5V, Test Current=10mA, China RoHS=Non-Compliant, Direction=Bidirectional, Element Configuration=Single, Height=2.5mm, Lead Free="Contains Lead", Length=4.57mm, Lifecycle Status=Production, Max Operating Temperature=150°C, Max Reverse Leakage Current=1.6mA, Max Surge Current=65.2A, Mounting Technology="Surface Mount", Number of Channels=1, Number of Elements=1, Number of Terminals=2, Packaging="Cut Tape", Peak Pulse Current=65.2A, Pins=2, Polarity=Bidirectional, Power Dissipation=600W, Power Rating=600W, Radiation Hardening=No, REACH SVHC=Affected, Reverse Breakdown Voltage=6.4V, RoHS=Compliant, Schedule B="8541100050, 8541100050", Termination=SMD/SMT, Voltage Rating (DC)=5V, Width=3.9mm, Working Voltage=5V
D5 D6 D7 D8: library part CMP-004-00052-1, "BAT54 Series 30 V 0.2 A Surfacec Mount Schottky Diode - SOD-323F", Ambient Temperature Range High=150°C, Average Rectified Current=200mA, Forward Voltage=240mV, Manufacturer Lifecycle Status="RELEASED FOR SUPPLY", Max Forward Surge Current (Ifsm)=600mA, Max Power Dissipation=550mW, Max Repetitive Reverse Voltage (Vrrm)=30V, Max Reverse Leakage Current=2µA, Min Operating Temperature=-65°C, Reverse Standoff Voltage=25V, China RoHS=Compliant, Contact Plating=Tin, Country of Origin="Mainland China, Malaysia", Element Configuration=Single, Export Control Classification Number (ECCN) Code=EAR99, Forward Current=200mA, Harmonized Tariff Schedule (HTS) Code=8541.10.00.70, Height=800µm, Introduction Date=2007-03-09, Lead Free="Lead Free", Lifecycle Status=Production, Max Junction Temperature (Tj)=150°C, Max Operating Temperature=150°C, Max Output current=200mA, Max Reverse Voltage (DC)=30V, Max Surge Current=600mA, Mounting Technology="Surface Mount", Number of Elements=1, Number of Terminals=2, Peak Non-Repetitive Surge Current=600mA, Peak Reverse Current=2µA, Pins=2, Radiation Hardening=No, REACH SVHC=Yes, Reverse Voltage=30V, RoHS=Compliant, Schedule B="8541100070, 8541100070"
IC1 IC5: "Integrated Circuit", Manufacturer_Name="Texas Instruments", Mouser Part Number=595-OPA376AIDBVR, Arrow Part Number=OPA376AIDBVR, Arrow Price/Stock=https://www.arrow.com/en/products/opa376aidbvr/texas-instruments.html?utm_currency=USD&region=europe, Datasheet Link=http://www.ti.com/lit/gpn/OPA376, Height=1.45mm, Manufacturer_Part_Number=OPA376AIDBVR, Mouser Price/Stock=https://www.mouser.co.uk/ProductDetail/Texas-Instruments/OPA376AIDBVR?qs=xL7PkI2RoJ57GVtJklM7uw%3D%3D
IC2 IC3 IC4: "Integrated Circuit", Manufacturer_Name="Texas Instruments", Mouser Part Number=595-TLV9061IDBVR, Arrow Part Number=TLV9061IDBVR, Arrow Price/Stock=https://www.arrow.com/en/products/tlv9061idbvr/texas-instruments?utm_currency=USD&region=nac, Datasheet Link=http://www.ti.com/lit/gpn/tlv9061, Height=1.45mm, Manufacturer_Part_Number=TLV9061IDBVR, Mouser Price/Stock=https://www.mouser.co.uk/ProductDetail/Texas-Instruments/TLV9061IDBVR?qs=w%2Fv1CP2dgqpra2GA6pq5aQ%3D%3D
J2 J3 J4 J5 J6: library part CMP-002-00094-2, "Large PCB pad"
L1: "Inductor", Manufacturer_Name=ABRACON, Mouser Part Number=815-ASPI0630LR4R7T15, Arrow Part Number=ASPI-0630LR-4R7M-T15, Arrow Price/Stock=https://www.arrow.com/en/products/aspi-0630lr-4r7m-t15/abracon?utm_currency=USD&region=nac, Datasheet Link=https://abracon.com/Magnetics/power/ASPI-0630LR.pdf, Manufacturer_Part_Number=ASPI-0630LR-4R7M-T15, Mouser Price/Stock=https://www.mouser.co.uk/ProductDetail/ABRACON/ASPI-0630LR-4R7M-T15?qs=bWAYEm3xoCYVuRmkzS1c6A%3D%3D
LED1: "LED", Manufacturer_Name=Dialight, Mouser Part Number=645-598-8070-107F, Arrow Part Number=598-8070-107F, Arrow Price/Stock=https://www.arrow.com/en/products/598-8070-107f/dialight?region=nac, Datasheet Link=https://www.mouser.in/datasheet/2/109/Dialight_CBI_data_598_0603_Apr2018-2944350.pdf, Height=0.8mm, Manufacturer_Part_Number=598-8070-107F, Mouser Price/Stock=https://www.mouser.co.uk/ProductDetail/Dialight/598-8070-107F?qs=7JStj%2FjQ2SEP6f6GzqcocA%3D%3D
R1 R36: library part CMP-009-00233-1, "Trimmer, Cermet, Rest 100 Kilohms, Pcb, Pwr-rtg 0.25W, Dim 0.264INLX0.177INWX0.285INH", Color=Blue, Insulation Resistance=1GΩ, Max Operating Temperature=125°C, Max Power Dissipation=250mW, Min Operating Temperature=-55°C, Temperature Coefficient=100ppm/°C, Tolerance=10%, Voltage Rating=300V, Composition=Cermet, Contact Plating=Tin, Depth=4.5mm, Height=7.24mm, Lead Diameter=460µm, Lead Length=4.88mm, Length=6.71mm, Lifecycle Status=Production, Military Standard=Not, Number of Terminals=3, Number of Turns=12, Pins=3, Pitch=2.54mm, Power Rating=250mW, Radiation Hardening=No, REACH SVHC=Affected, RoHS=Compliant, Schedule B="8533400080, 8533400080", Taper=Linear, Termination=Pin, Thickness=5.59mm, Type=Potentiometer, Voltage Rating (AC)=300V, Voltage Rating (DC)=300V, Weight=425.242847mg, Width=4.5mm, Working Voltage=300V
R2 R3: "Resistor", Manufacturer_Name=ROYALOHM, Mouser Part Number=303-0603WAF1005T5E, Datasheet Link=https://eu.mouser.com/datasheet/3/5925/1/1.pdf, Height=0.55mm, Manufacturer_Part_Number=0603WAF1005T5E, Mouser Price/Stock=https://www.mouser.co.uk/ProductDetail/Royalohm/0603WAF1005T5E?qs=e8oIoAS2J1TtIpBlPWLC5w%3D%3D
R4 R5 R8 R12 R13 R14 R15 R16 R17 R18: "Resistor", Manufacturer_Name="UNI-ROYAL(Uniroyal Elec)"
  R4 R5: Datasheet Link=https://datasheet.lcsc.com/szlcsc/Uniroyal-Elec-0402WGF4702TCE_C25792.pdf, Height=0.4mm, Manufacturer_Part_Number=0402WGF4702TCE
  R8: Datasheet Link=https://datasheet.lcsc.com/szlcsc/Uniroyal-Elec-0603WAF1003T5E_C25803.pdf, Height=0.55mm, Manufacturer_Part_Number=0603WAF1003T5E
  R12 R14: Datasheet Link=https://datasheet.lcsc.com/szlcsc/Uniroyal-Elec-0603WAF1001T5E_C21190.pdf, Height=0.55mm, Manufacturer_Part_Number=0603WAF1001T5E
  R13: Datasheet Link=https://www.lcsc.com/datasheet/lcsc_datasheet_2206010100_UNI-ROYAL-Uniroyal-Elec-0603WAF220JT5E_C23345.pdf, Height=0.55mm, Manufacturer_Part_Number=0603WAF220JT5E
  R15 R16: Datasheet Link=https://datasheet.lcsc.com/lcsc/2110252130_UNI-ROYAL-Uniroyal-Elec-0603WAF2702T5E_C22967.pdf, Height=0.55mm, Manufacturer_Part_Number=0603WAF2702T5E
  R17 R18: Datasheet Link=https://datasheet.lcsc.com/szlcsc/Uniroyal-Elec-0603WAF4701T5E_C23162.pdf, Height=0.55mm, Manufacturer_Part_Number=0603WAF4701T5E
R6 R7: "Resistor", Manufacturer_Name=ROYALOHM, Mouser Part Number=303-0402WGF1004TCE, Datasheet Link=https://www.mouser.ca/datasheet/2/1365/1-3044649.pdf, Height=0.4mm, Manufacturer_Part_Number=0402WGF1004TCE, Mouser Price/Stock=https://www.mouser.co.uk/ProductDetail/Royalohm/0402WGF1004TCE?qs=e8oIoAS2J1Sm8qYhjADD%252Bg%3D%3D
R9: "Resistor", Manufacturer_Name="Uniroyal Elec", Datasheet Link=https://datasheet.lcsc.com/szlcsc/Uniroyal-Elec-0603WAF3303T5E_C23137.pdf, Height=0.55mm, Manufacturer_Part_Number=0603WAF3303T5E
R10: library part CMP-009-00239-1, "Res Thick Film 0603 3.3M Ohm 1% 0.1W(1/10W) ±100ppm/C Pad SMD T/R", Case/Package=0603, Max Operating Temperature=155°C, Min Operating Temperature=-55°C, Power Rating=100mW, Temperature Coefficient=100ppm/°C, Tolerance=1%, Working Voltage=75V, China RoHS=Non-Compliant, Height=450µm, Length=1.6mm, Lifecycle Status=Production, Mounting Technology="Surface Mount", Number of Terminals=2, REACH SVHC=Unaffected, RoHS=Compliant, Width=800µm
R11: "Resistor", Manufacturer_Name="Stackpole Electronics", Mouser Part Number=708-RMCF0805JT22K0, Arrow Part Number=RMCF0805JT22K0, Arrow Price/Stock=https://www.arrow.com/en/products/rmcf0805jt22k0/stackpole-electronics?region=nac, Datasheet Link=https://cs.seielect.com/catalog/SEI-RMCF_RMCP.pdf, Height=0.65mm, Manufacturer_Part_Number=RMCF0805JT22K0, Mouser Price/Stock=https://www.mouser.co.uk/ProductDetail/SEI-Stackpole/RMCF0805JT22K0?qs=FESYatJ8odJj8AR7KQYlug%3D%3D
R19 R20 R21 R22: "Resistor", Manufacturer_Name=ROYALOHM, Datasheet Link=https://www.mouser.de/datasheet/2/1365/1-3044649.pdf, Height=0.55mm, Manufacturer_Part_Number=0603WAF3003T5E
R23 R24 R26: library part CMP-009-00240-1, "Fixed Resistor, Metal Glaze/Thick Film, 0.1W, 100000ohm, 75V, 1% +/-Tol, Surface Mount, 0603", Case/Package=0603, Max Operating Temperature=155°C, Min Operating Temperature=-55°C, Power Rating=100mW, Temperature Coefficient=100ppm/°C, Tolerance=1%, Working Voltage=50V, Export Control Classification Number (ECCN) Code=EAR99, Harmonized Tariff Schedule (HTS) Code=8533.21.00.30, Height=450µm, Length=1.6mm, Lifecycle Status=Production, Mounting Technology="Surface Mount", Number of Terminals=2, REACH SVHC=Unaffected, RoHS=Compliant, Width=800µm
R25: "Resistor", Manufacturer_Name=ROYALOHM, Mouser Part Number=303-0603WAF1004T5E, Datasheet Link=https://eu.mouser.com/datasheet/3/5925/1/1.pdf, Height=0.55mm, Manufacturer_Part_Number=0603WAF1004T5E, Mouser Price/Stock=https://www.mouser.co.uk/ProductDetail/Royalohm/0603WAF1004T5E?qs=e8oIoAS2J1ROidUp2W57ZQ%3D%3D
SW1: library part CMP-011-00018-1, "Slide Switch, 2 Positions, SPDT, Latched, 0.3A, 6VDC, Solder Terminal, Surface Mount-straight", Case/Package=SMD/SMT, Color=Black, Contact Current Rating=300mA, Contact Resistance=70mΩ, Insulation Resistance=100MΩ, Max Operating Temperature=85°C, Max Voltage Rating (DC)=6V, Min Operating Temperature=-40°C, Actuator Length=2.0066mm, Actuator Material=Nylon, Contact Plating=Silver, Country of Origin="Mainland China", Current Rating=300mA, Depth=7.5mm, Electrical Life=5kcycles, Export Control Classification Number (ECCN) Code=EAR99, Harmonized Tariff Schedule (HTS) Code=8536.50.90.50, Height=3.5mm, Housing Material=Nylon, Introduction Date=2009-12-16, Length=8.5mm, Life (Cycles)=5kcycles, Lifecycle Status=Production, Max Current Rating=300mA, Mounting Technology="Surface Mount", Number of Positions=1, Orientation=Straight, Packaging="Tape and Reel", Radiation Hardening=No, REACH SVHC=Unaffected, RoHS=Compliant, Switch Function=On-On, Switch Travel=2mm, Terminal Material=Brass, Termination=Solder, Throw Configuration=SPDT, Voltage Rating (DC)=6V
U1: library part CMP-014-00006-1, "IC INST AMP 1 CIRCUIT 8VSSOP Instrumentation Amplifier 1 Circuit Rail-to-Rail 8-VSSOP", Ambient Temperature Range High=125°C, Case/Package=VSSOP, Input Bias Current=70pA, Input Offset Voltage (Vos)=25µV, Manufacturer Lifecycle Status=ACTIVE, Max Dual Supply Voltage=2.75V, Max Junction Temperature (Tj)=150°C, Max Supply Current=75µA, Max Supply Voltage=5.5V, Min Dual Supply Voltage=900mV, Min Operating Temperature=-40°C, Min Supply Voltage=1.8V, Nominal Supply Current=50µA, Output Current per Channel=40mA, Power Supply Rejection Ratio (PSRR)=120dB, Voltage Gain=60dB, -3db Bandwidth=150kHz, Bandwidth=150kHz, Common Mode Rejection Ratio=100dB, Gain Bandwidth Product=150kHz, Height=0m, Lead Free="Lead Free", Length=3mm, Lifecycle Status=Production, Max Operating Temperature=125°C, Number of Amplifiers=1, Number of Channels=1, Number of Circuits=1, Number of Elements=3, Operating Supply Current=50µA, Pins=8, Quiescent Current=50µA, Radiation Hardening=No, REACH SVHC=Unaffected, RoHS=Compliant, Schedule B="8542330000, 8542330000", Slew Rate=0.16V/µs, Thickness=970µm, Weight=26.506804mg, Width=3mm
U3: library part CMP-019-00055-1, "500mA 40dB@(100kHz) Fixed 3.3V Positive 6.5V DFN-6(2x2) Linear Voltage Regulators (LDO) ROHS", Dropout Voltage=950mV, Manufacturer Lifecycle Status=ACTIVE, Max Operating Temperature=125°C, Min Operating Temperature=-40°C, Output Current=500mA, Output Voltage=3.3V, Quiescent Current=30µA, Height=800µm, Lead Free="Lead Free", Length=2mm, Lifecycle Status=Production, Mounting Technology="Surface Mount", Number of Channels=1, Number of Regulators=1, Output Type=Fixed, Packaging="Cut Tape", Pins=6, RoHS=Compliant, Schedule B="8542390000, 8542390000", Thickness=750µm, Width=2mm
U5: library part CMP-014-00008-1, "4-Channel Single ADC Delta-Sigma 860sps 16-bit Serial 10-Pin VSSOP T/R", Case/Package=VSSOP, Manufacturer Lifecycle Status=ACTIVE, Max Operating Temperature=125°C, Max Power Dissipation=500µW, Max Supply Voltage=5.5V, Min Operating Temperature=-40°C, Min Supply Voltage=2V, Nominal Supply Current=150µA, Operating Supply Voltage=3.3V, Power Dissipation=900µW, Contact Plating=Gold, Conversion Rate=860sps, Height=1.07mm, Integral Nonlinearity (INL)=1LSB, Interface=I2C, Lead Free="Lead Free", Length=3mm, Lifecycle Status=Production, Max Supply Voltage (DC)=5.5V, Min Supply Voltage (DC)=2V, Number of A/D Converters=1, Number of Bits=16, Number of Channels=4, Number of Converters=1, Number of Elements=1, Number of Inputs=4, Pins=10, Polarity=Bipolar, Radiation Hardening=No, REACH SVHC=No, Resolution=2B, RoHS=Compliant, Sampling Rate=860sps, Schedule B="8542390000, 8542390000", Supply Type=Single, Termination=SMD/SMT, Thickness=1.02mm, Width=3mm
U6: library part CMP-020-00029-1

## Free pads (board coordinates)
  round 5 hole 3.1: 18(5.006,5.006) 18(5.006,75.006) 18(75.006,5.006) 18(75.006,75.006)
  round 1.5 smd: 19(28.702,67.564) 19(28.702,70.104) 19(28.702,72.644) 19(28.702,75.184) 19(30.099,31.75) 19(34.417,31.877) 19(42.164,9.779) 19(52.034,59.944) 19(52.034,62.484)

## Via types
v1: diameter 0.5, hole 0.3, Top Layer to Bottom Layer, tented both sides, 526 vias
v2: diameter 0.7, hole 0.4, Top Layer to Bottom Layer, tented both sides, 3 vias

## Nets (pads, with @x,y where several pads share a name; then routed paths per layer and width w, separated by ;. In a path a pad name is that pad's centre, name@x,y a point inside that pad or via, vN(x,y) a via of type N, cw(c..) or ccw(c..) an arc to the next point about the centre after c; other vN are vias at no path point)
1.5V: C9.2 IC4.3 pad.19@42.164,9.779 R2.2 R3.2 R9.1 R10.1 R12.1 R13.2 R16.1 R19.2 R20.2 U1.5 | length 118.5
  Top Layer w0.254: R16.1 38.9,28.042 39.223,27.719 39.248,27.719 39.488,27.479 39.958,27.479 v1(40.005,27.432) ; v1(39.367,23.761) 39.434,23.761 39.669,23.526 40.444,23.526 R12.1 ; R13.2@41.594,13.081 v1(42.444,13.081) ; pad.19@42.164,9.779 42.164,11.475 42.444,11.755 42.444,13.208 43.294,13.208 C9.2@43.344,13.258 ; R9.1@44.261,42.545 v1@45.466,42.545 ; R10.1@49.657,42.545 v1(50.8,42.545) ; R19.2 50.508,19.329 51.134,19.955 51.134,20.273 v1(51.181,20.32) ; v1@56.388,29.591 56.599,29.38 U1.5@56.599,28.915 ; v1(57.404,12.319) 57.592,12.131 IC4.3@57.592,11.298 ; R20.2 61.859,18.106 62.564,18.81 62.564,19.13 v1(62.611,19.177) ; v1(62.103,32.893) 62.322,32.893 62.858,33.429 R3.2@62.983,33.429 ; R2.2 63.797,24.338 v1(63.797,25.217)
  Bottom Layer w0.254: v1(40.005,27.432) 39.37,27.432 38.49,26.552 38.49,24.638 v1(39.367,23.761) 39.367,20.32 ; v1@42.444,13.208 40.132,13.208 39.367,13.973 39.367,20.32 ; v1(45.459,42.546) v1(50.8,42.545) 50.8,42.478 51.181,42.097 51.181,29.591 ; v1(56.356,29.58) 51.192,29.58 51.181,29.591 ; v1(57.404,12.319) 57.404,16.002 ; v1(62.103,32.893) 62.992,32.893 63.881,32.004 63.881,28.686 63.797,28.602 v1(63.797,25.217) 63.797,23.157 61.341,20.701 61.341,19.876 61.993,19.224 62.564,19.224 v1(62.611,19.177) 62.611,17.78 60.833,16.002 57.404,16.002 ; 39.367,20.32 v1(51.181,20.32) ; v1(51.181,20.32) 51.181,29.591 ; v1(51.181,20.32) 51.181,16.256 51.435,16.002 57.404,16.002
3.3V: C1.2 C2.2 C3.2 C12.2 C14.2 C18.2 C23.2 C32.2 D5.1 D6.1 IC1.5 IC2.5 IC3.5 IC4.5 IC5.5 R17.2 R18.2 R36.1 U1.7 U3.1 U5.8 | length 24.8
  Top Layer w0.254: v1@28.702,35.306 28.872,35.306 D6.1 ; U5.8 v1(36.231,41.656) 37.084,40.803 C12.2@37.084,40.728 ; D5.1 35.898,35.433 v1@35.941,35.433 ; C2.2@37.719,25.742 v1(40.151,25.742) 40.891,26.482 IC1.5@41.016,26.482 ; IC5.5@42.098,14.473 42.098,14.537 42.246,14.685 42.879,14.685 v1(42.926,14.732) 43.903,14.732 C3.2@43.942,14.771 ; v1(51.816,67.691) R17.2 ; R18.2@51.816,74.156 v1(51.816,75.057) ; IC2.5@53.208,17.592 53.333,17.592 53.481,17.74 53.481,17.865 54.444,18.828 C14.2@54.444,21.336 ; C23.2@53.848,13.423 55.392,13.423 55.692,13.723 IC4.5@55.692,13.848 ; U1.7@56.599,27.615 57.574,27.615 v1(57.955,27.996) 57.944,28.007 57.944,29.224 57.824,29.343 C1.2@57.824,30.48 ; IC3.5@60.203,19.492 60.2,19.494 60.2,20.191 60.198,20.193 60.198,21.043 60.237,21.082 60.237,21.883 v1@60.452,22.098
  other v1: 54.991,13.462 53.963,18.346 54.444,20.082 60.474,22.137 24.892,26.035 25.527,26.035 24.892,26.797 25.527,26.797 57.824,29.41 28.705,35.331 35.945,35.431
5VIN: C24.2 C35.1 J2.1 L1.2
+5: C15.1 C16.2 C17.2 C22.2 D4.2 L1.1 R14.1 U3.4 U3.6 U6.7 | length 32.8
  Top Layer w0.254: R14.1 19.917,78.359 20.066,78.21 20.066,67.691 20.955,66.802 22.86,66.802 25.273,64.389 25.273,60.347 25.676,59.944 29.21,59.944 U6.7
D0: pad.19@52.034,59.944 U6.8 | length 3.3
  Top Layer w0.254: U6.8 pad.19@52.034,59.944
D1: pad.19@52.034,62.484 U6.9 | length 3.3
  Top Layer w0.254: U6.9 pad.19@52.034,62.484
D7: pad.19@28.702,75.184 U6.1 | length 3.3
  Top Layer w0.254: pad.19@28.702,75.184 U6.1
D8: pad.19@28.702,72.644 U6.2 | length 3.3
  Top Layer w0.254: pad.19@28.702,72.644 U6.2
D9: pad.19@28.702,70.104 U6.3 | length 3.3
  Top Layer w0.254: pad.19@28.702,70.104 U6.3
D10: pad.19@28.702,67.564 U6.4 | length 3.3
  Top Layer w0.254: pad.19@28.702,67.564 U6.4
GND: C1.1 C2.1 C3.1 C4.1 C6.1 C7.1 C8.1 C9.1 C11.1 C12.1 C14.1 C15.2 C16.1 C17.1 C18.1 C22.1 C23.1 C24.1 C32.1 C35.2 D1.1 D2.1 D3.1 D4.1 D7.2 D8.2 IC1.2 IC2.2 IC3.2 IC4.2 IC5.2 J3.1 LED1.1 pad.18 R36.3 U1.4 U3.5 U3.7 U5.1 U5.3 U5.6 U5.7 U6.6 | length 3.1
  Top Layer w0.254: C22.1 C22.1@20.193,21.241 ; v1(41.01,18.52) 41.159,18.669 C11.1@41.783,18.669 ; IC5.2 41.021,18.266 ; IC1.2 v1(44.196,27.432)
  other v1: 67.564,1.397 11.176,1.778 64.77,2.921 70.358,2.921 8.382,3.302 13.97,3.302 67.564,4.445 11.176,4.699 16.764,4.699 64.77,5.842 70.358,5.842 8.382,6.223 13.97,6.223 61.976,7.366 67.564,7.366 11.176,7.62 16.764,7.62 78.486,8.128 59.182,8.89 64.77,8.89 70.358,8.89 2.794,9.144 8.382,9.144 13.97,9.144 19.558,9.144 75.946,9.271 25.146,9.398 30.734,9.525 36.322,9.525 47.498,9.525 53.086,9.525 5.588,10.668 11.176,10.668 16.764,10.668 22.352,10.795 27.94,10.922 33.528,10.922 39.116,10.922 44.704,10.922 50.292,10.922 2.032,12.065 3.556,12.065 5.08,12.065 6.477,12.065 13.97,12.192 19.558,12.192 25.146,12.319 47.498,12.319 30.734,12.446 55.245,12.446 61.468,12.446 56.642,12.573 1.27,12.827 2.794,12.827 4.318,12.827 5.842,12.827 7.239,12.827 8.382,13.589 11.176,13.589 16.764,13.589 22.352,13.716 49.911,13.716 58.674,13.716 62.992,13.716 68.58,13.716 27.94,13.843 56.642,13.843 41.021,14.605 54.356,14.732 8.382,14.986 13.97,15.113 19.558,15.113 47.498,15.113 65.786,15.113 25.146,15.24 30.734,15.367 42.291,15.875 8.382,16.51 11.176,16.51 68.58,16.51 16.764,16.637 22.352,16.764 53.086,16.764 58.674,16.764 27.94,16.891 43.942,17.78 8.382,17.907 47.371,17.907 65.786,17.907 71.374,17.907 13.97,18.034 19.558,18.161 25.146,18.288 54.864,18.288 74.422,18.288 77.597,18.288 30.734,18.415 58.928,18.415 44.704,19.304 68.58,19.304 22.352,19.558 27.94,19.685 62.23,19.939 65.786,20.701 71.374,20.701 58.039,20.828 25.146,20.955 55.88,20.955 30.734,21.082 36.322,21.082 41.91,21.082 47.498,21.082 58.547,21.336 56.388,21.463 63.119,21.463 59.055,21.844 56.896,21.971 64.643,22.225 65.532,22.225 66.421,22.225 67.31,22.225 68.199,22.225 27.94,22.352 59.563,22.352 72.263,22.352 73.025,22.352 33.528,22.479 50.292,22.479 57.404,22.479 62.103,22.606 57.912,22.987 59.817,22.987 61.595,23.114 58.166,23.622 59.817,23.622 25.146,23.749 30.734,23.749 65.786,23.749 66.421,23.749 67.056,23.749 72.644,23.749 47.498,23.876 53.086,23.876 61.595,23.876 55.753,24.003 62.611,24.384 61.595,24.638 64.77,24.686 67.818,24.892 72.644,25.019 27.94,25.146 33.528,25.146 62.611,25.146 50.292,25.273 61.595,25.4 68.58,25.654 62.611,25.908 61.595,26.162 30.734,26.543 47.498,26.67 53.086,26.67 62.611,26.67 65.786,27.051 71.374,27.051 62.611,27.432 74.549,27.559 77.724,27.559 33.528,27.94 50.292,28.067 27.94,28.194 62.611,28.194 68.58,28.448 62.611,28.956 58.674,29.21 30.734,29.337 47.498,29.464 6.477,29.718 25.146,29.718 61.595,29.718 62.611,29.718 65.786,29.845 71.374,29.845 35.56,30.226 61.595,30.48 62.611,30.48 50.292,30.861 27.94,31.115 62.992,31.115 3.683,31.242 9.271,31.242 61.595,31.242 64.643,31.369 65.532,31.369 66.421,31.369 67.31,31.369 68.199,31.369 72.263,31.496 73.025,31.496 41.91,32.258 47.498,32.258 53.086,32.258 6.477,32.639 25.146,32.639 65.786,32.893 66.421,32.893 67.056,32.893 72.771,32.893 39.116,33.655 50.292,33.655 67.818,33.782 22.352,33.909 72.771,33.909 27.94,34.036 3.683,34.163 9.271,34.163 41.91,35.052 47.498,35.052 53.086,35.052 66.675,35.179 19.558,35.433 6.477,35.56 12.065,35.56 25.146,35.56 69.469,36.322 39.116,36.449 44.704,36.449 50.292,36.449 35.941,36.703 22.352,36.83 27.94,36.957 63.881,36.957 3.683,37.084 9.271,37.084 72.263,37.465 41.91,37.846 47.498,37.846 53.086,37.846 66.675,38.1 19.558,38.354 6.477,38.481 12.065,38.481 25.146,38.481 75.057,39.116 69.469,39.243 22.352,39.751 27.94,39.878 63.881,39.878 3.683,40.005 9.271,40.005 72.263,40.386 52.705,40.513 66.675,41.021 19.558,41.275 6.477,41.402 12.065,41.402 25.146,41.402 55.499,41.656 61.087,41.656 75.057,42.037 69.469,42.164 22.352,42.672 27.94,42.799 52.705,42.799 58.293,42.799 63.881,42.799 3.683,42.926 9.271,42.926 72.263,43.307 55.499,43.942 61.087,43.942 66.675,43.942 12.065,44.069 19.558,44.196 6.477,44.323 25.146,44.323 31.115,44.45 49.911,44.577 75.057,44.958 58.293,45.085 63.881,45.085 69.469,45.085 44.323,45.212 9.271,45.593 22.352,45.593 33.909,45.593 27.94,45.72 52.705,45.72 3.683,45.847 66.675,46.228 72.263,46.228 47.117,46.355 61.087,46.482 36.703,46.736 55.499,46.863 12.065,46.99 19.558,47.117 6.477,47.244 25.146,47.244 49.911,47.244 31.115,47.625 63.881,47.752 69.469,47.752 75.057,47.879 58.293,48.006 52.705,48.387 9.271,48.514 22.352,48.514 27.94,48.641 3.683,48.768 33.909,48.768 61.087,49.149 66.675,49.149 72.263,49.149 47.117,49.276 55.499,49.53 12.065,49.911 36.703,49.911 19.558,50.038 6.477,50.165 25.146,50.165 49.911,50.419 58.293,50.673 63.881,50.673 69.469,50.673 31.115,50.8 75.057,50.8 39.497,51.054 9.271,51.435 22.352,51.435 27.94,51.562 52.705,51.562 3.683,51.689 33.909,51.943 61.087,52.07 66.675,52.07 72.263,52.07 42.291,52.197 19.558,52.451 25.146,52.578 55.499,52.705 12.065,52.832 6.477,53.086 36.703,53.086 49.911,53.34 63.881,53.594 69.469,53.594 75.057,53.721 58.293,53.848 39.497,54.229 9.271,54.356 27.94,54.483 52.705,54.483 3.683,54.61 66.675,54.991 72.263,54.991 31.242,55.118 61.087,55.245 42.291,55.372 55.499,55.626 12.065,55.753 6.477,56.007 36.703,56.261 45.085,56.515 63.881,56.515 69.469,56.515 75.057,56.642 58.293,56.769 14.859,57.15 9.271,57.277 39.497,57.404 3.683,57.531 32.512,57.531 61.087,57.912 66.675,57.912 72.263,57.912 42.291,58.547 12.065,58.674 6.477,58.928 58.293,59.436 63.881,59.436 69.469,59.436 75.057,59.563 45.085,59.69 14.859,60.071 9.271,60.198 3.683,60.452 61.087,60.833 66.675,60.833 72.263,60.833 36.322,61.214 12.065,61.595 42.291,61.722 6.477,61.849 58.293,62.357 63.881,62.357 69.469,62.357 75.057,62.484 45.085,62.865 14.859,62.992 9.271,63.119 3.683,63.373 61.087,63.754 66.675,63.754 72.263,63.754 36.322,64.135 12.065,64.516 6.477,64.77 58.293,65.278 63.881,65.278 69.469,65.278 39.116,65.405 75.057,65.405 26.67,65.659 28.956,65.659 14.859,65.913 9.271,66.04 3.683,66.294 41.91,66.675 61.087,66.675 66.675,66.675 72.263,66.675 36.322,66.929 17.653,67.31 12.065,67.437 6.477,67.691 24.892,67.818 58.293,68.199 63.881,68.199 69.469,68.199 39.116,68.326 75.057,68.326 14.859,68.834 9.271,68.961 3.683,69.215 22.352,69.342 41.91,69.596 61.087,69.596 66.675,69.596 72.263,69.596 36.322,69.85 17.653,70.231 12.065,70.358 6.477,70.612 25.146,70.612 44.704,70.993 58.293,71.12 63.881,71.12 69.469,71.12 39.116,71.247 14.859,71.755 9.271,71.882 22.352,72.136 41.91,72.517 61.087,72.517 66.675,72.517 36.322,72.771 17.653,73.152 12.065,73.279 25.146,73.406 44.704,73.914 58.293,74.041 63.881,74.041 69.469,74.041 39.116,74.168 14.859,74.676 9.271,74.803 22.352,74.93 41.91,75.438 61.087,75.438 66.675,75.438 55.499,75.565 36.322,75.692 12.065,76.073 17.653,76.073 25.146,76.2 44.704,76.835 58.293,76.962 63.881,76.962 69.469,76.962 39.116,77.089 50.038,77.089 52.705,77.089 33.528,77.216 27.94,77.47 22.352,77.724 41.91,78.359 47.498,78.486 55.499,78.486 36.322,78.613 30.734,78.74 25.146,78.994
  other v2: 71.501,16.764 71.501,26.162 71.628,35.179
NetC4_2: C4.2 R2.1 R4.2 R6.2 U1.2 | length 12.9
  Top Layer w0.254: R6.2@59.288,25.719 59.288,25.755 59.155,25.888 59.155,26.593 59.155,27.185 59.585,27.615 U1.2 60.787,27.577 61.615,27.577 62.103,27.088 62.103,23.534 62.867,22.77 62.992,22.77 63.754,22.77 64.611,22.77 64.77,22.929 64.77,22.939 64.794,22.963 65.947,22.963 R4.2@65.971,22.987 ; R6.2@59.415,25.719 59.527,25.607 R6.2@59.563,25.607
NetC5_1: C5.1 IC1.1 R8.2 R15.1 | length 11
  Top Layer w0.254: R15.1 41.275,30.353 42.037,29.591 42.037,27.325 42.88,26.482 IC1.1 43.388,26.482 43.561,26.309 43.561,25.908 43.599,25.87 R8.2 43.599,23.11 C5.1
NetC5_2: C5.2 IC1.4 R8.1 R12.2 | length 7.4
  Top Layer w0.254: IC1.4 40.98,28.382 41.529,27.833 41.529,26.698 41.999,26.228 R8.1 ; R12.2 41.961,24.803 R8.1 ; C5.2 42.122,24.642 R8.1
NetC6_2: C6.2 R3.1 R5.2 R7.2 U1.3 | length 13.1
  Top Layer w0.254: R7.2@58.547,25.596 58.572,25.596 58.695,25.719 58.695,25.762 58.801,25.868 58.801,27.332 59.703,28.234 60.15,28.234 60.163,28.247 60.731,28.247 U1.3 ; U1.3@61.275,28.265 U1.3 ; R5.2@65.971,32.131 65.955,32.147 64.786,32.147 64.77,32.163 64.77,32.141 64.611,31.982 64.589,31.982 64.586,31.979 62.983,31.979 62.858,31.979 62.66,31.781 62.66,31.656 62.103,31.099 62.103,28.676 61.692,28.265 U1.3
NetC7_2: C7.2 D1.2 J4.1 R4.1 | length 10
  Top Layer w0.254: R4.1 67.028,23.045 C7.2@67.817,23.045 ; C7.2@67.818,23.045 71.501,23.045 ; D1.2 71.501,23.172 71.628,23.045 76.145,23.045 J4.1
NetC8_2: C8.2 D2.2 J5.1 R5.1 | length 9.7
  Top Layer w0.254: R5.1@67.207,32.22 67.238,32.189 71.628,32.189 ; D2.2 71.628,32.189 ; J5.1 76.107,32.189 71.628,32.189
NetC10_1: C10.1 U1.6 | length 4
  Top Layer w0.254: C10.1 52.616,28.283 56.581,28.283 U1.6@56.599,28.265
NetC10_2: C10.2 IC1.3 SW1.2 | length 10.4
  Top Layer w0.254: IC1.3 43.211,28.352 45.085,28.352 ; SW1.2 45.085,28.352 ; C10.2 47.547,28.352 45.085,28.352
NetC11_2: C11.2 IC5.3 R36.2 | length 7.6
  Top Layer w0.254: R36.2 35.692,17.023 40.101,17.023 40.198,17.023 40.101,17.12 40.101,18.318 C11.2@40.004,18.415
NetC13_1: C13.1 D6.2 D8.1 pad.19@30.099,31.75 R16.2 U5.5 | length 20.9
  Top Layer w0.254: pad.19@30.099,31.75 32.131,31.75 ; U5.5 31.982,40.656 32.131,40.507 32.131,39.009 31.973,38.851 31.973,38.831 C13.1@31.616,38.474 ; D6.2 32.131,34.798 ; D8.1 32.131,36.703 ; C13.1@31.597,38.474 C13.1@31.616,38.474 ; R16.2@37.273,28.067 36.981,28.359 36.981,28.805 36.83,28.956 34.17,28.956 32.131,30.995 32.131,31.75 ; C13.1@31.616,38.474 31.973,38.117 31.973,38.098 32.131,37.94 32.131,36.703 ; 32.131,31.75 32.131,36.703
NetC13_2: C13.2 D5.2 D7.1 pad.19@34.417,31.877 R15.2 U5.4 | length 20.6
  Top Layer w0.254: U5.4@31.593,41.156 32.101,41.156 32.512,40.745 32.512,39.011 32.672,38.851 32.672,38.831 C13.2@33.029,38.474 ; 32.512,36.703 D7.1 ; C13.2 C13.2@33.029,38.474 ; D5.2 32.485,34.798 ; pad.19@34.417,31.877 32.485,31.877 ; R15.2 37.015,30.03 37.015,29.522 36.803,29.31 34.317,29.31 32.485,31.142 32.485,31.877 ; 32.485,31.877 32.485,34.798 ; 32.485,34.798 32.485,37.911 32.672,38.098 32.672,38.117 C13.2@33.029,38.474
NetC19_1: C19.1 IC2.1 R21.1 R23.2 | length 6.8
  Top Layer w0.254: R21.1 50.86,16.659 C19.1 52.07,15.631 53.616,15.631 R23.2@53.733,15.748 ; R23.2@53.733,15.848 55.329,17.444 55.61,17.444 IC2.1@55.758,17.592
NetC19_2: C19.2 IC2.4 R19.1 R21.2 | length 3.8
  Top Layer w0.254: R21.2 50.86,18.139 C19.2 52.07,19.266 52.169,19.365 IC2.4
NetC20_1: C20.1 IC3.1 R22.1 R24.2 | length 10.6